# Altium PCB slave.PcbDoc (part 1 of 7)
Units mil, origin at the board's own origin, x right, y up, seen from the top; angles counter-clockwise.
Board outline 6299.21 x 3937.01 mil, 6 copper layers (Top Copper, FUSED_VBAT-, Signal Layer 2, Signal Layer 3, VREG, Bot Copper), stack 65.355 mil thick; 495 components, 307 nets, 1435 pads, 1866 vias.
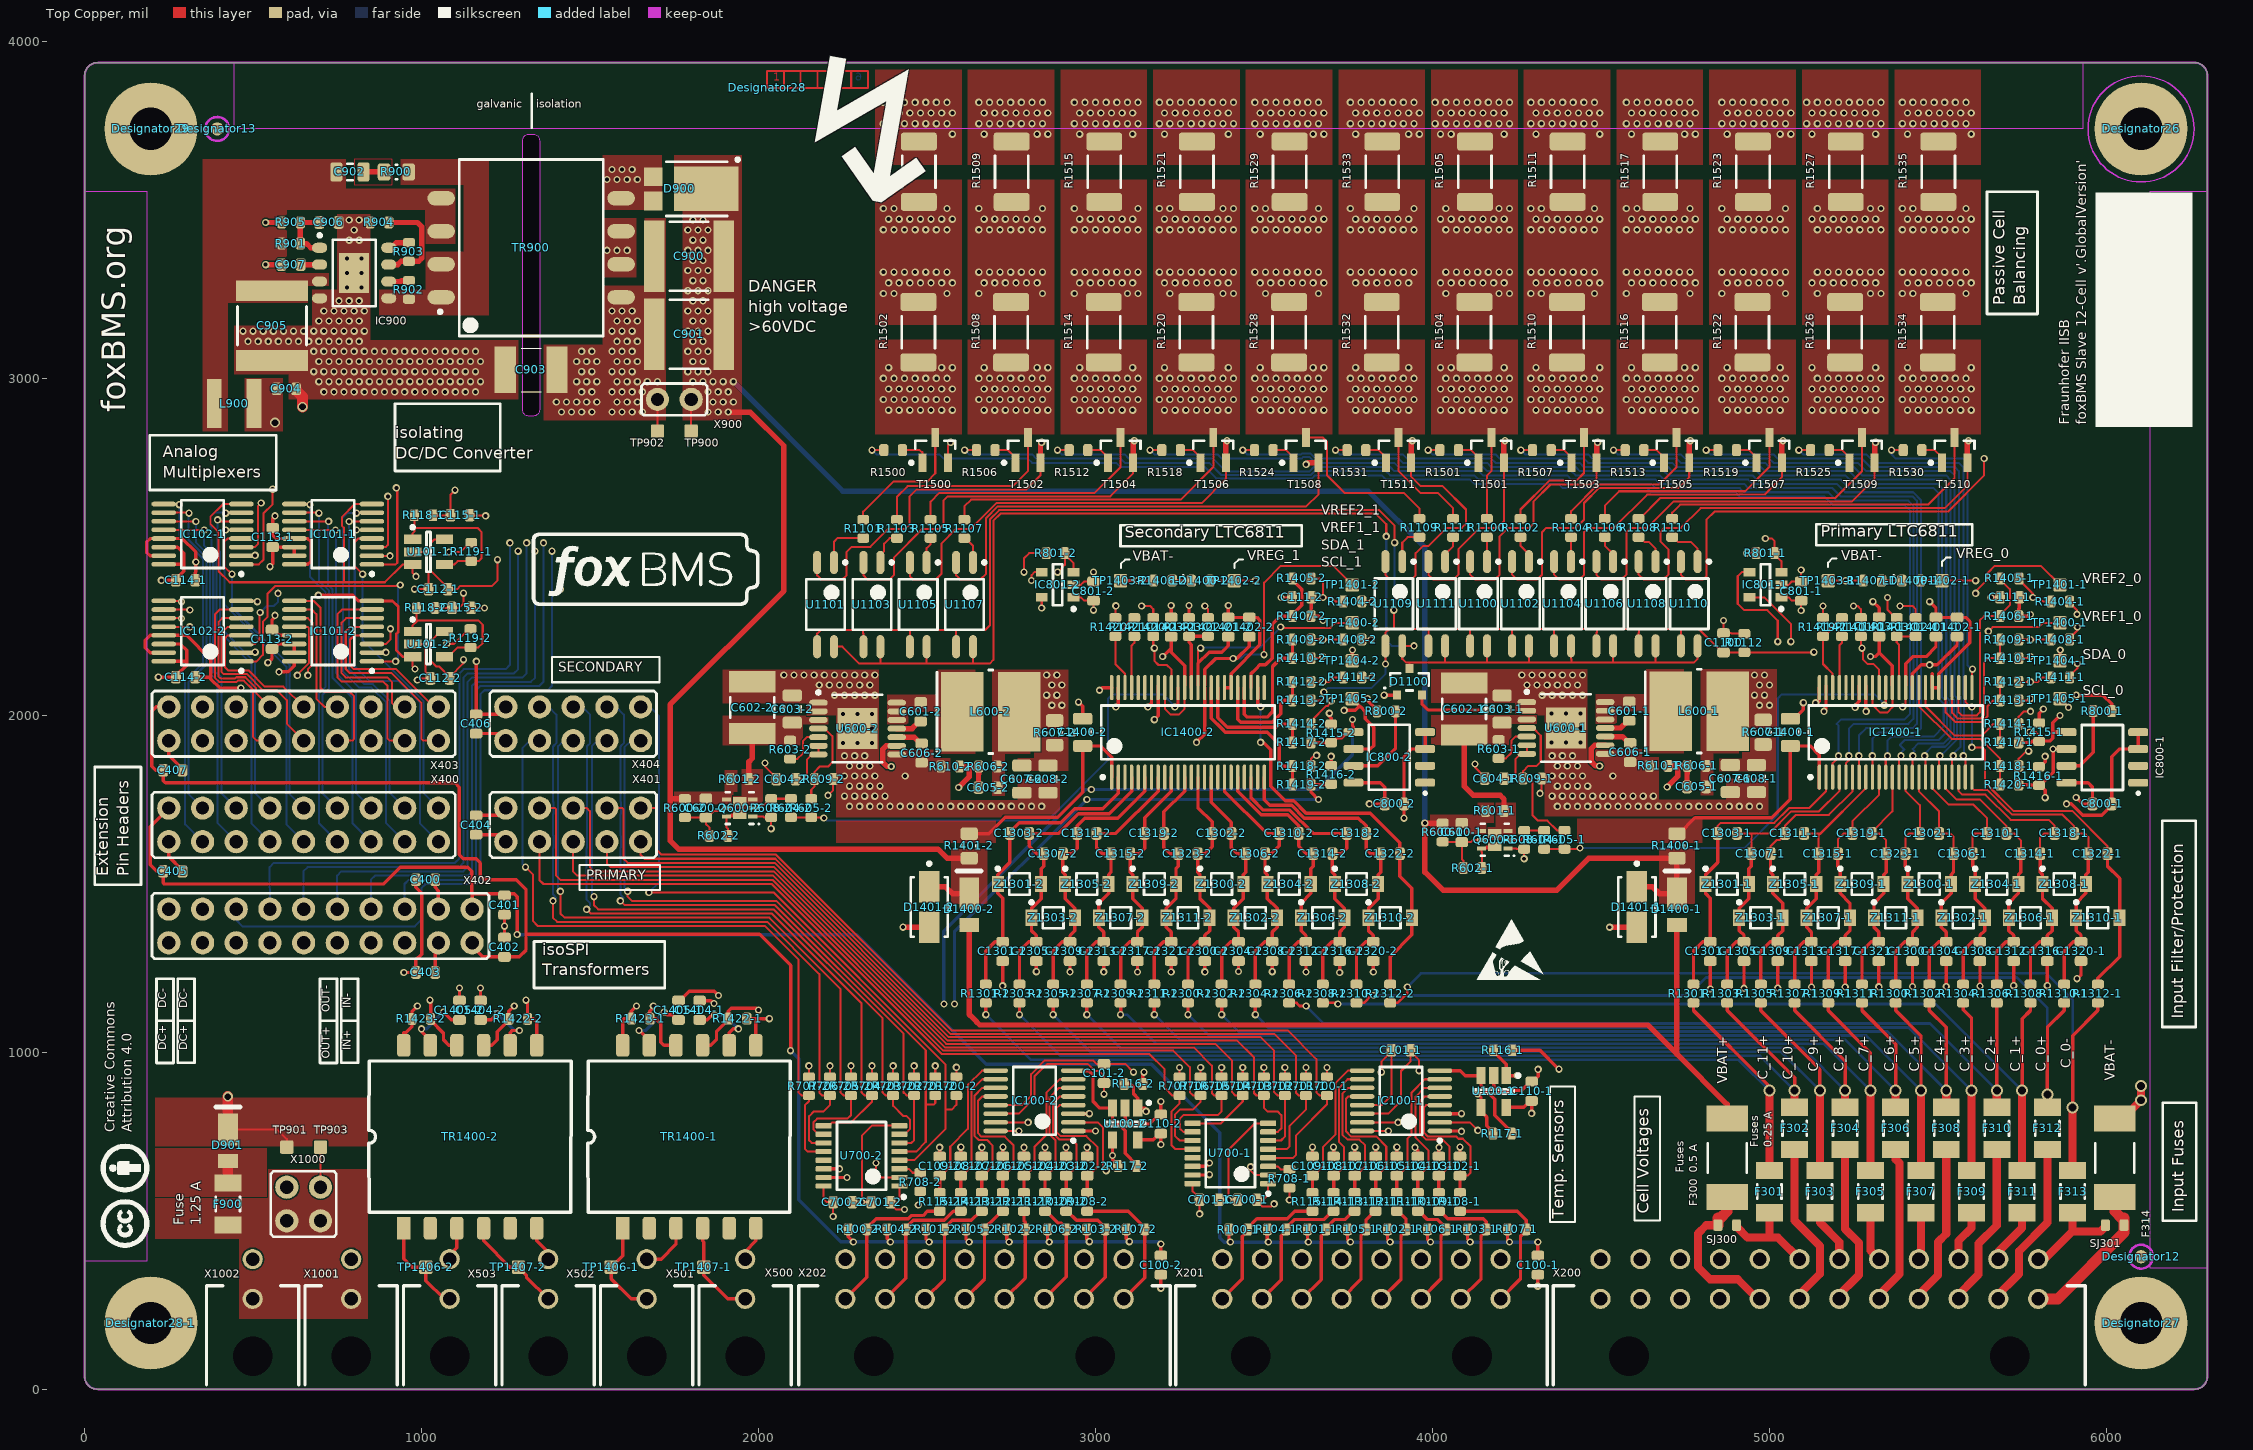
[diagram p0: Top Copper view]
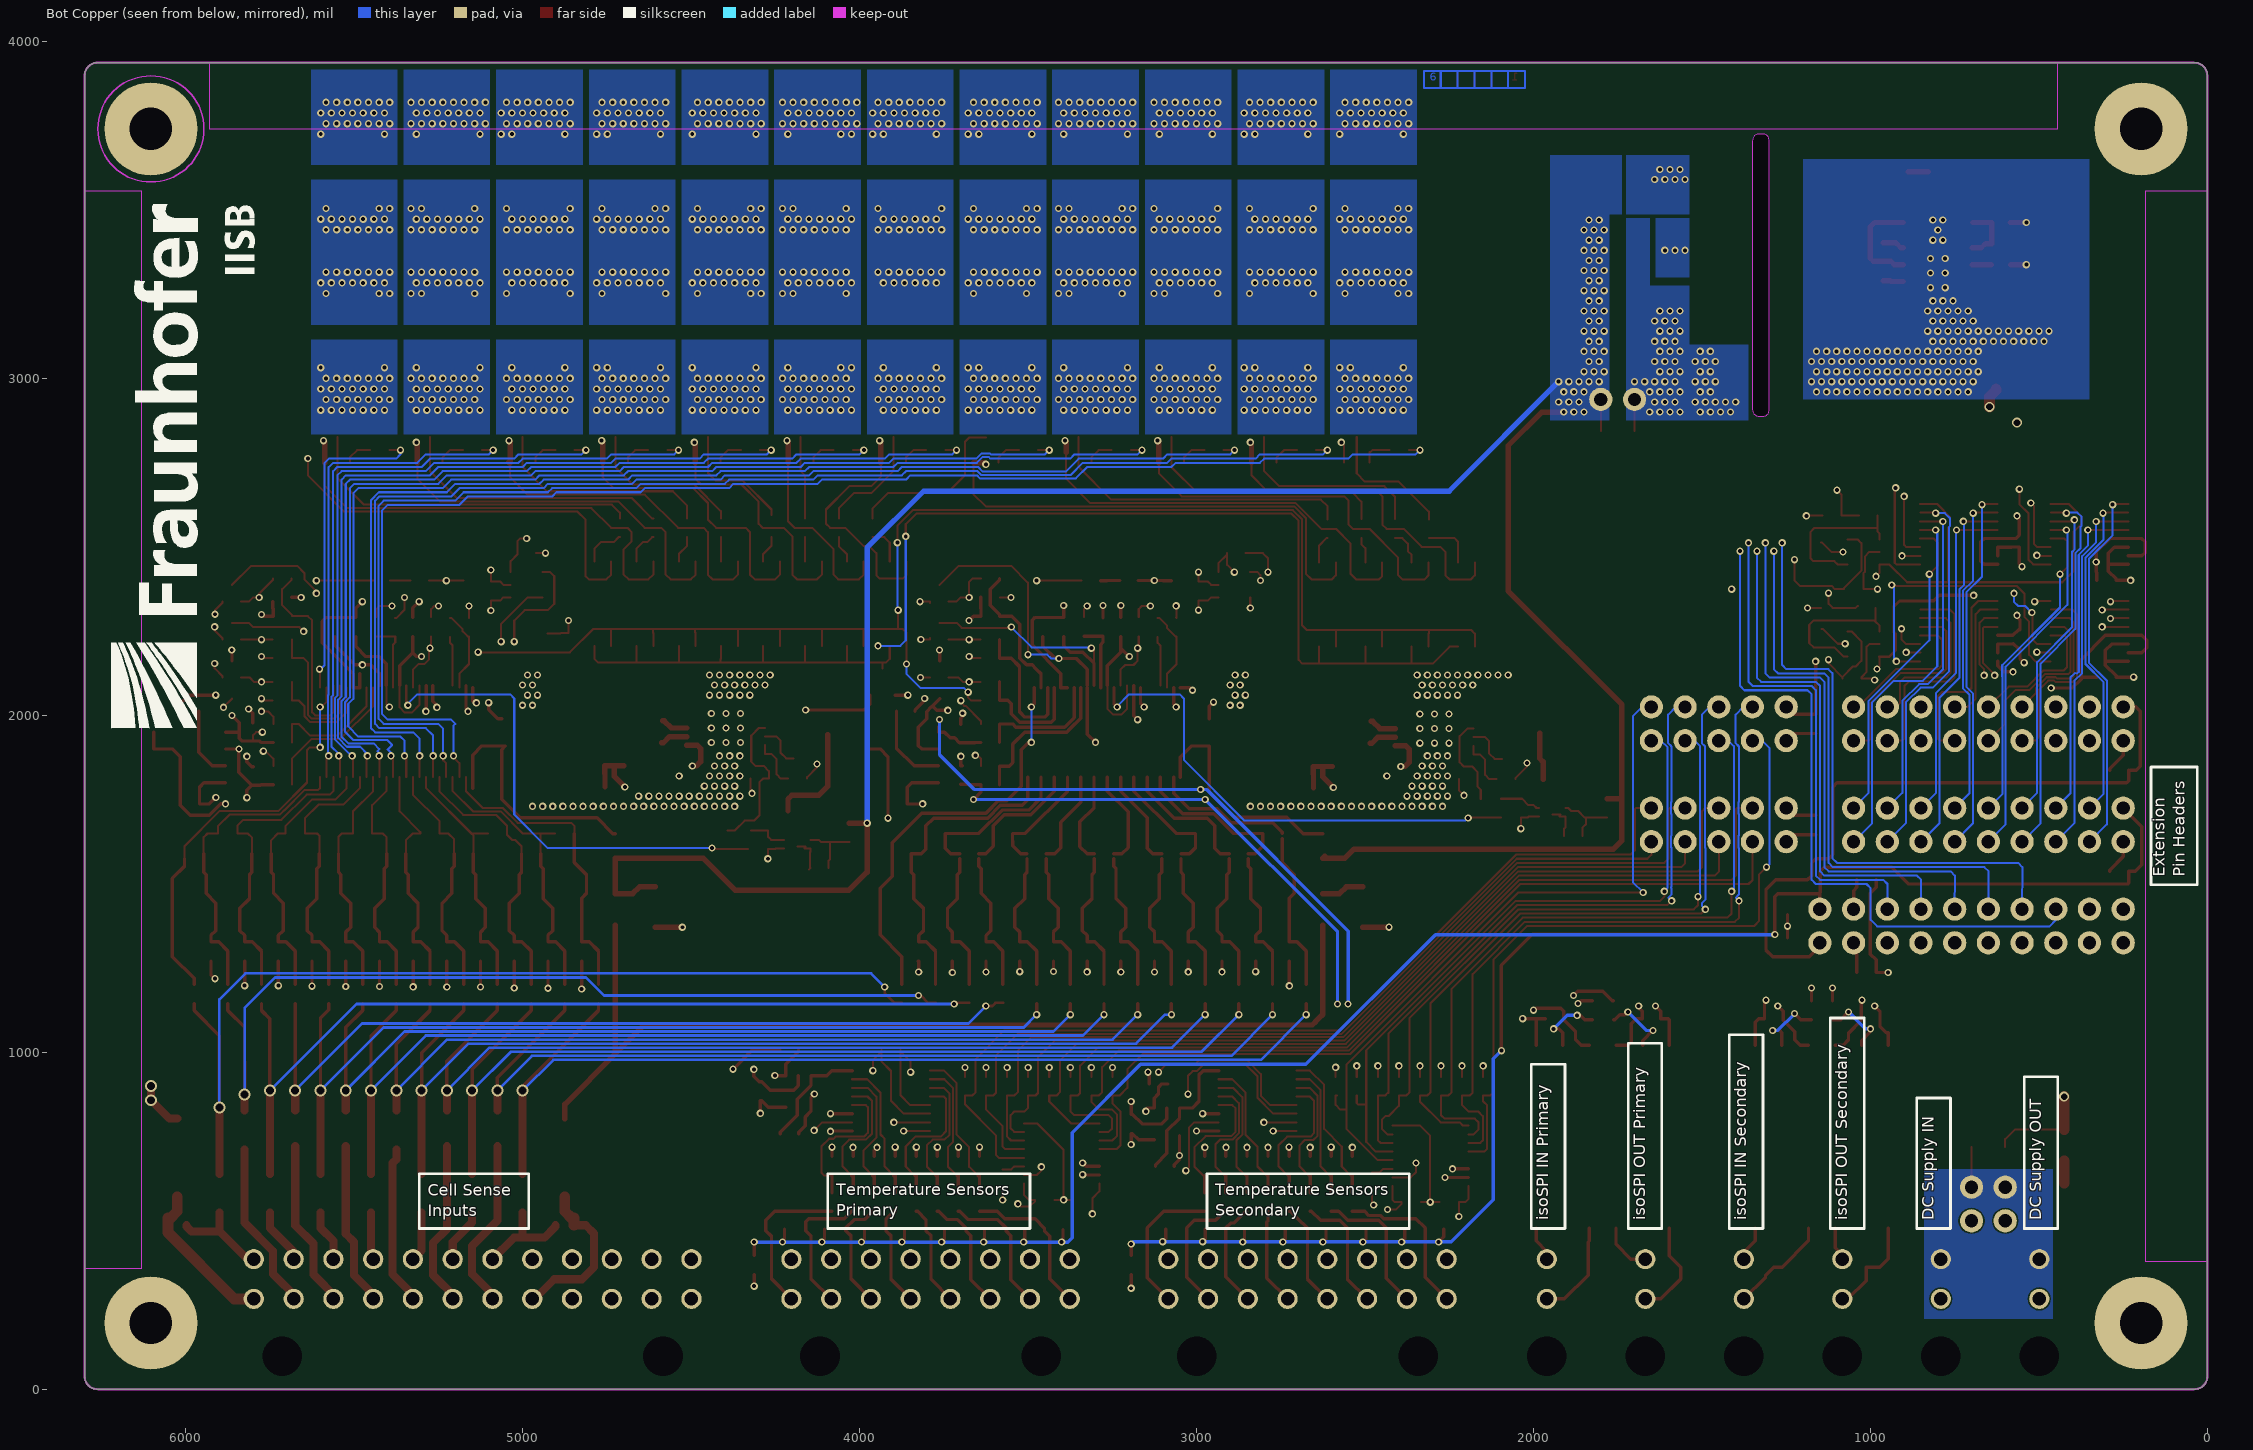
[diagram p1: Bot Copper view, seen from below]
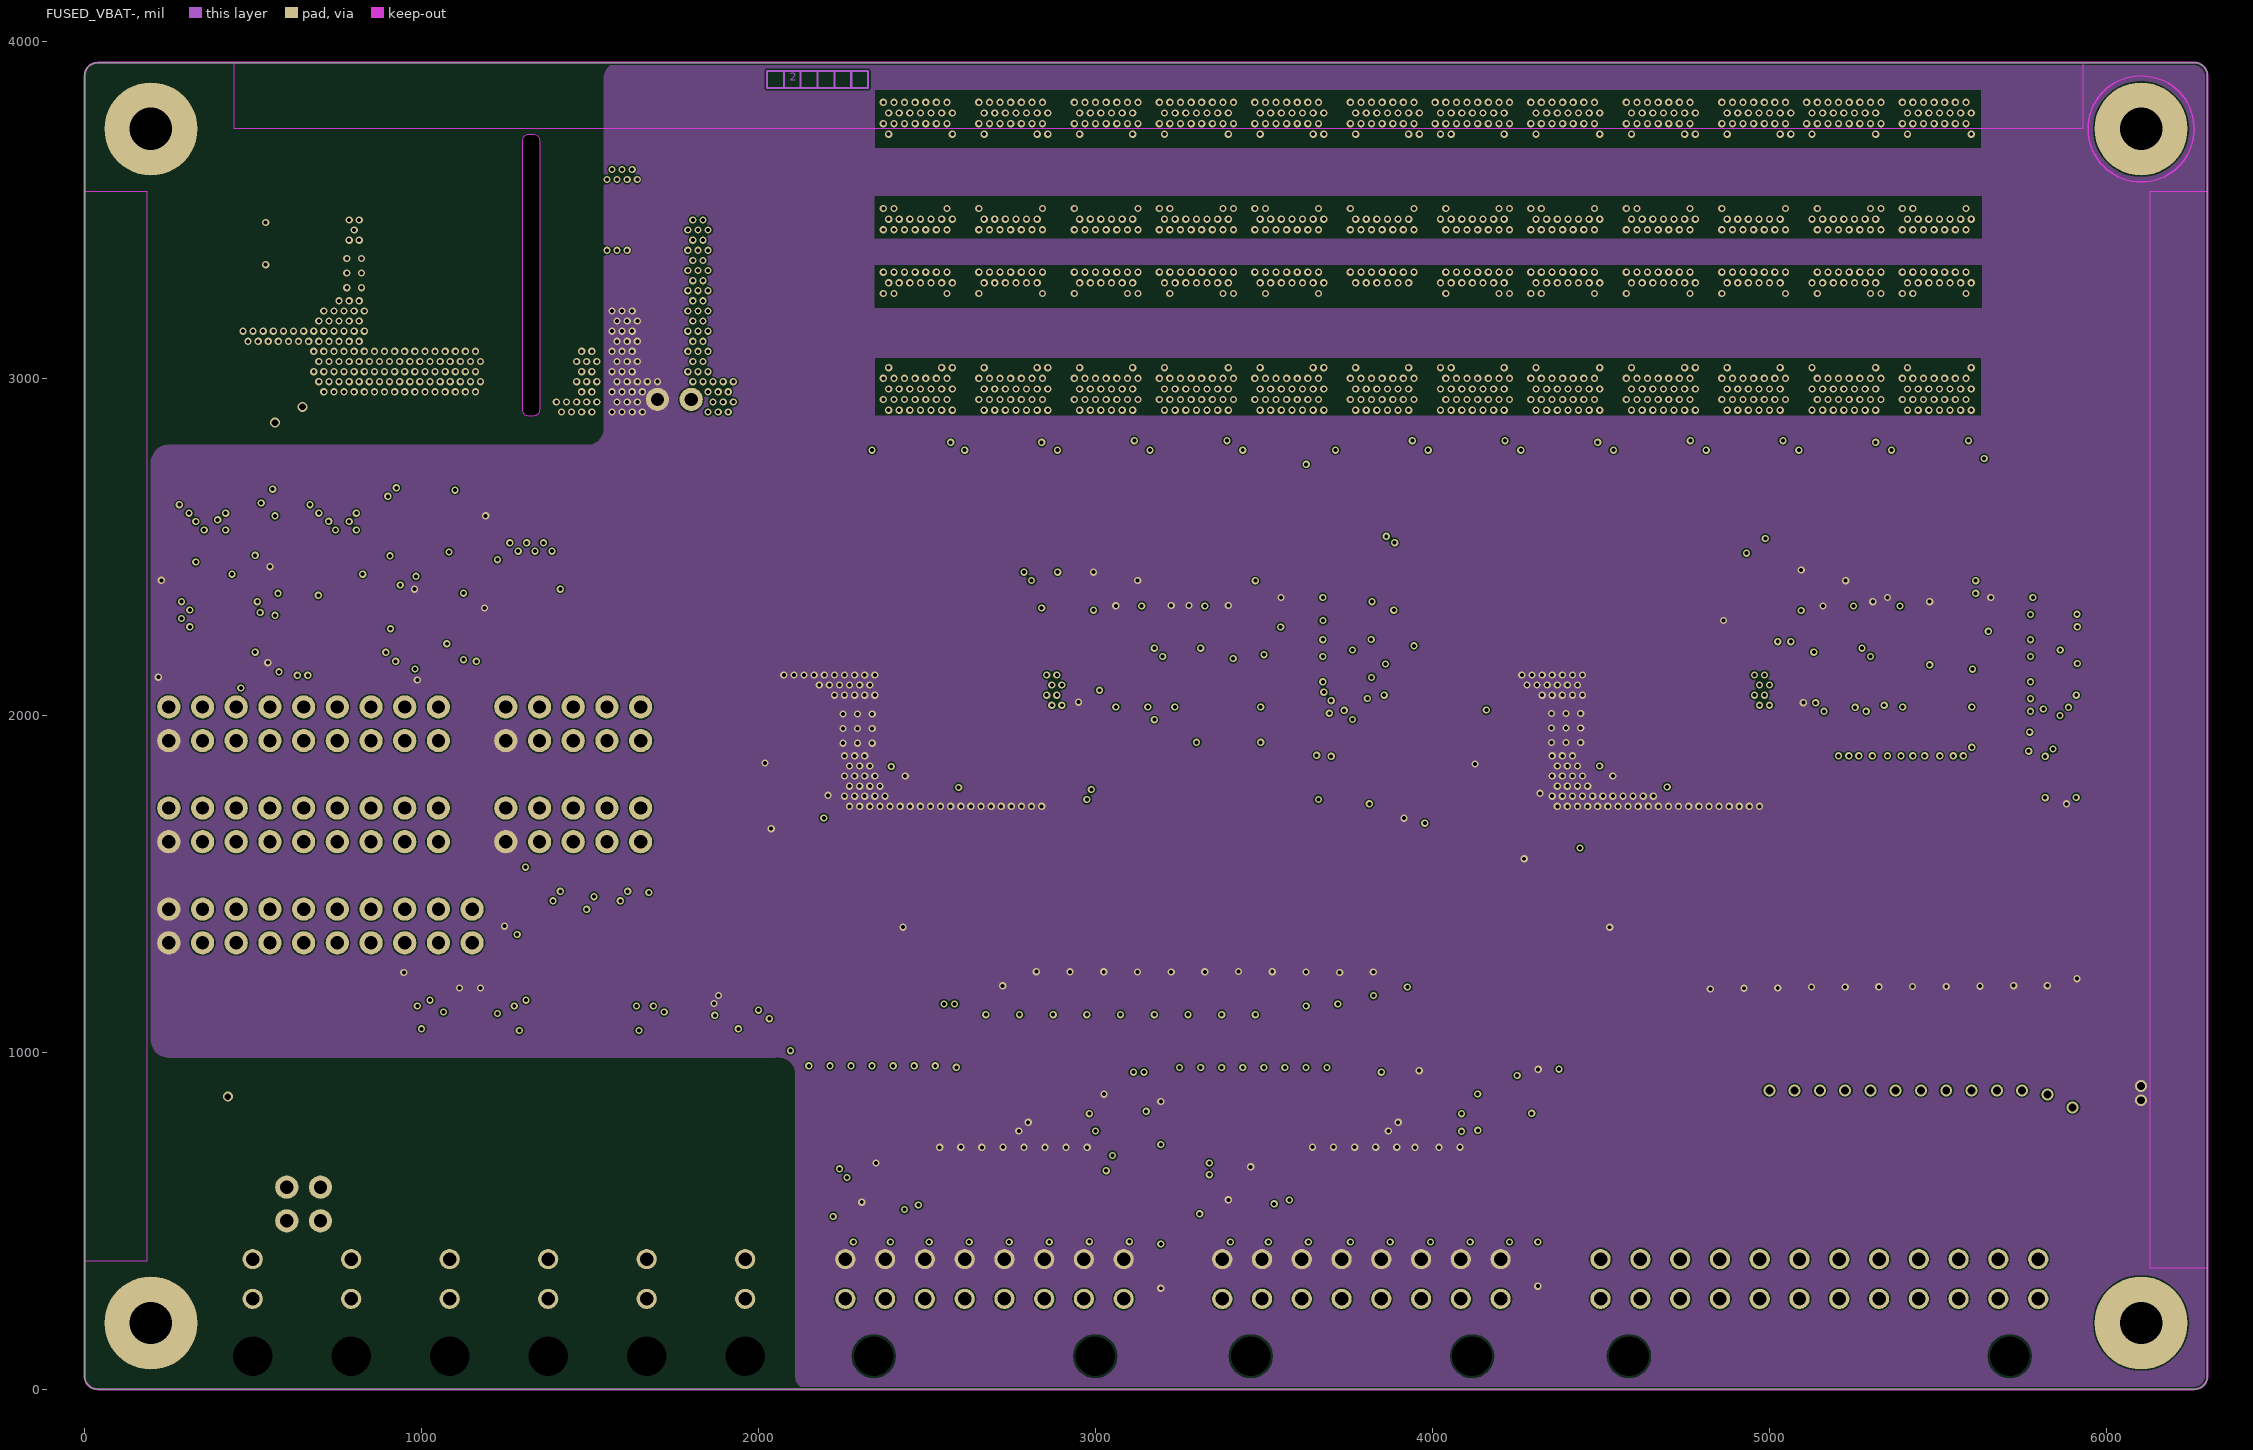
[diagram p2: FUSED_VBAT-]
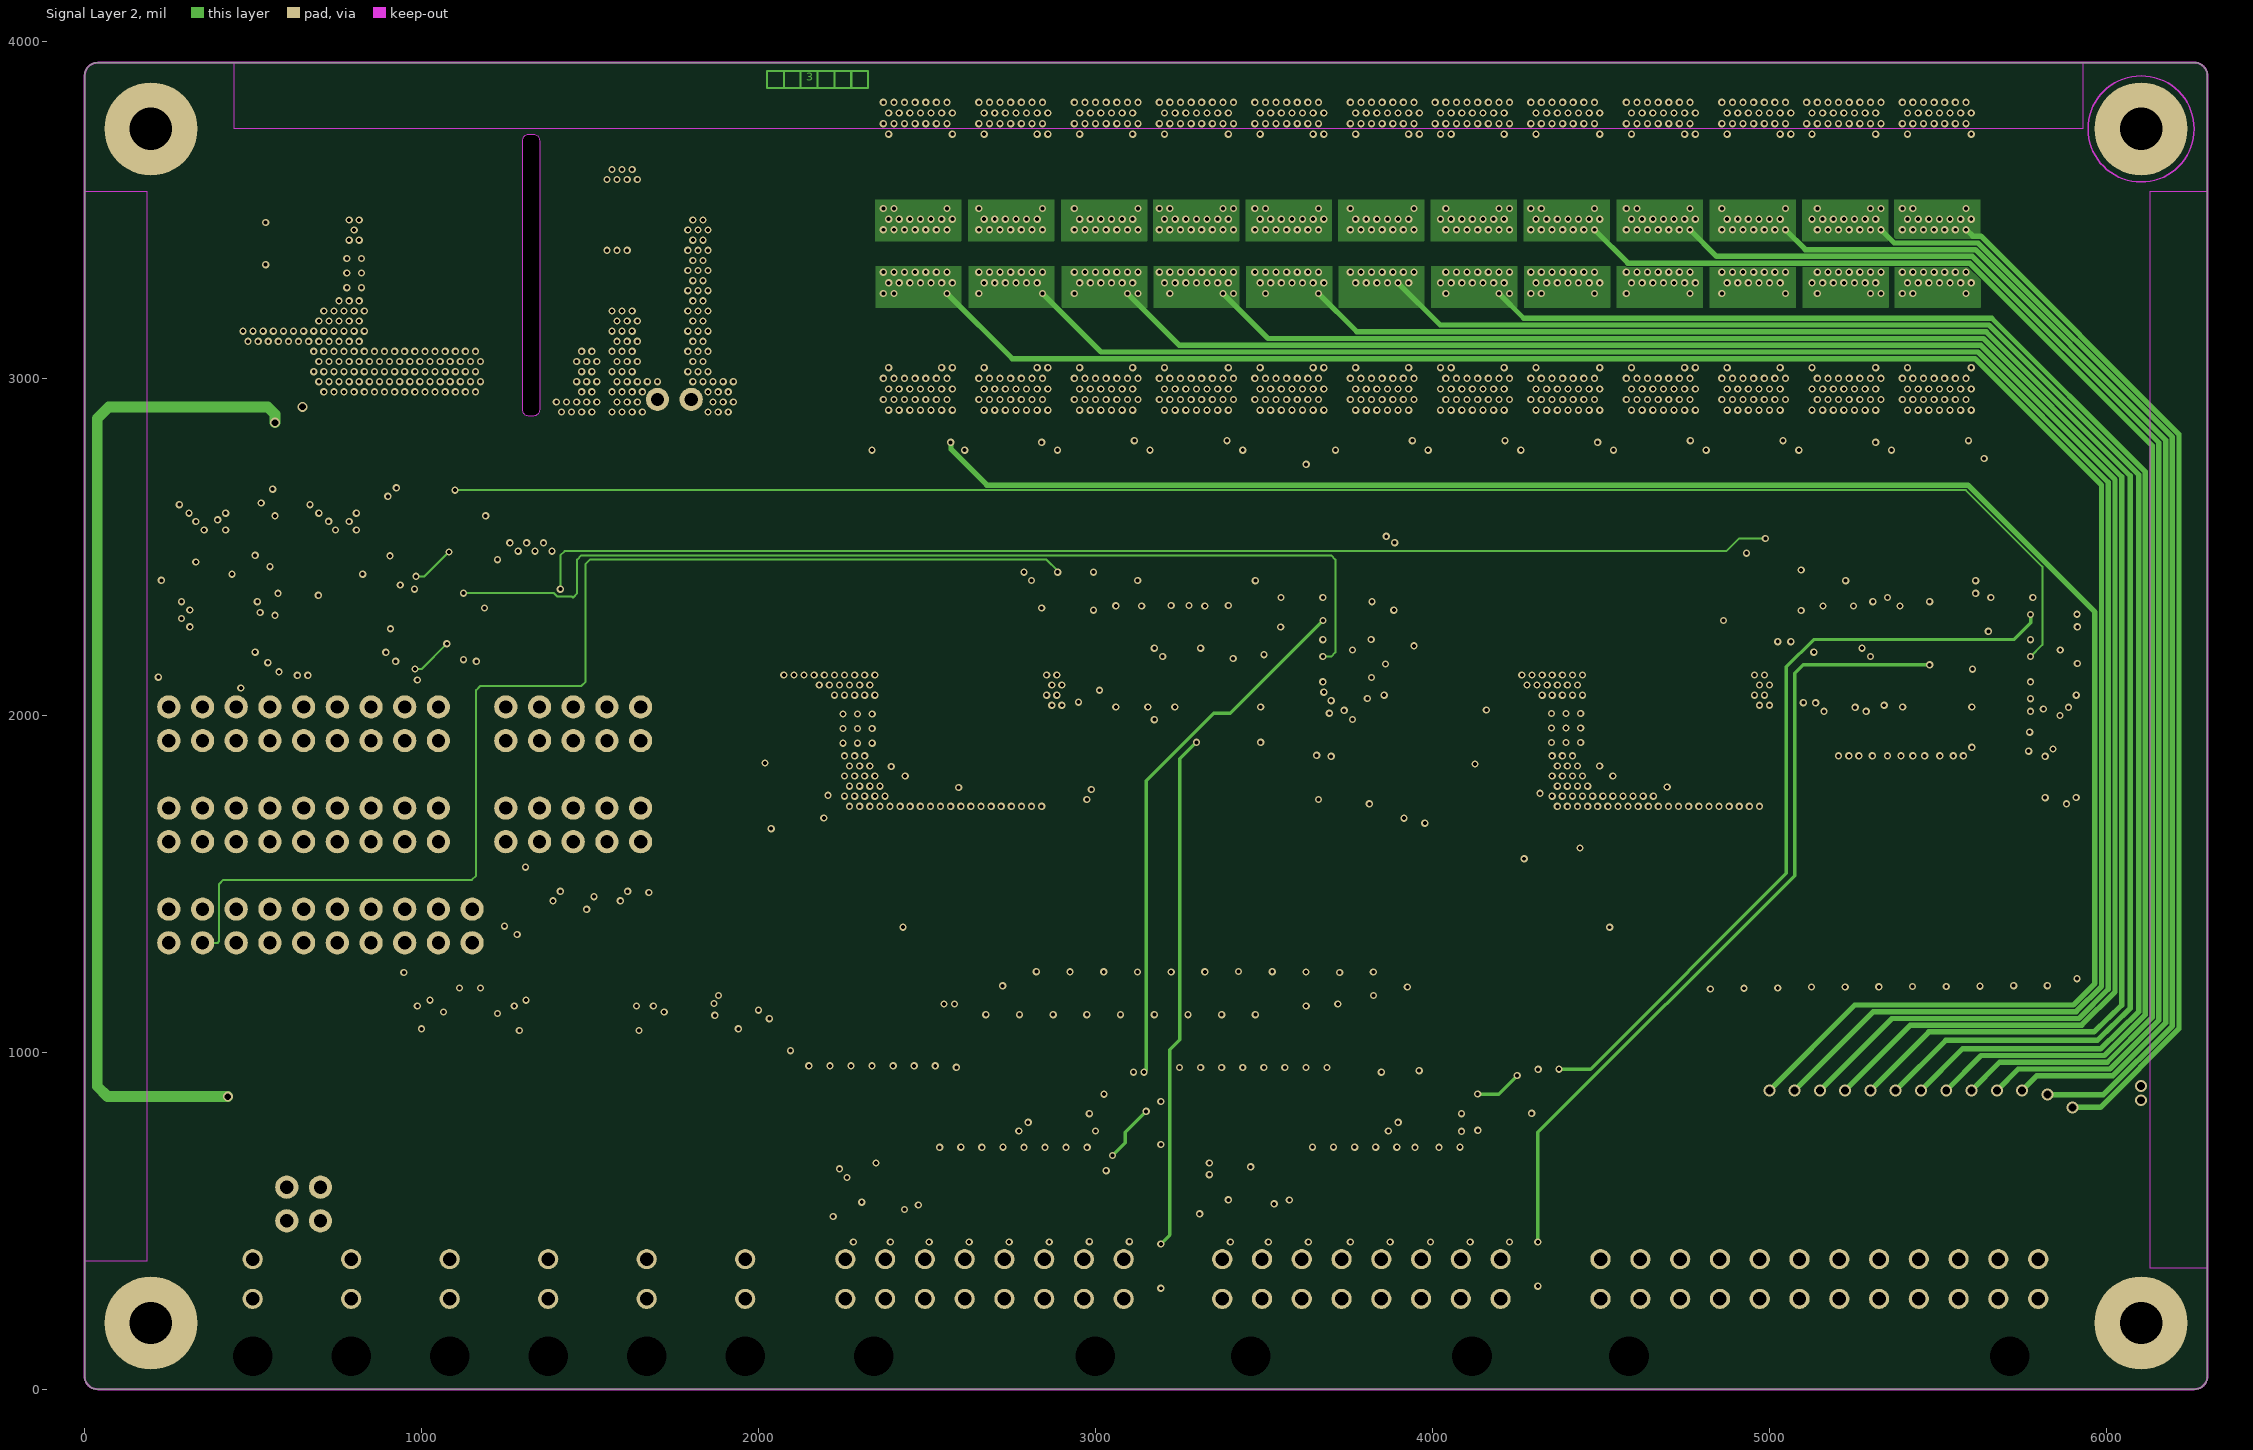
[diagram p3: Signal Layer 2]
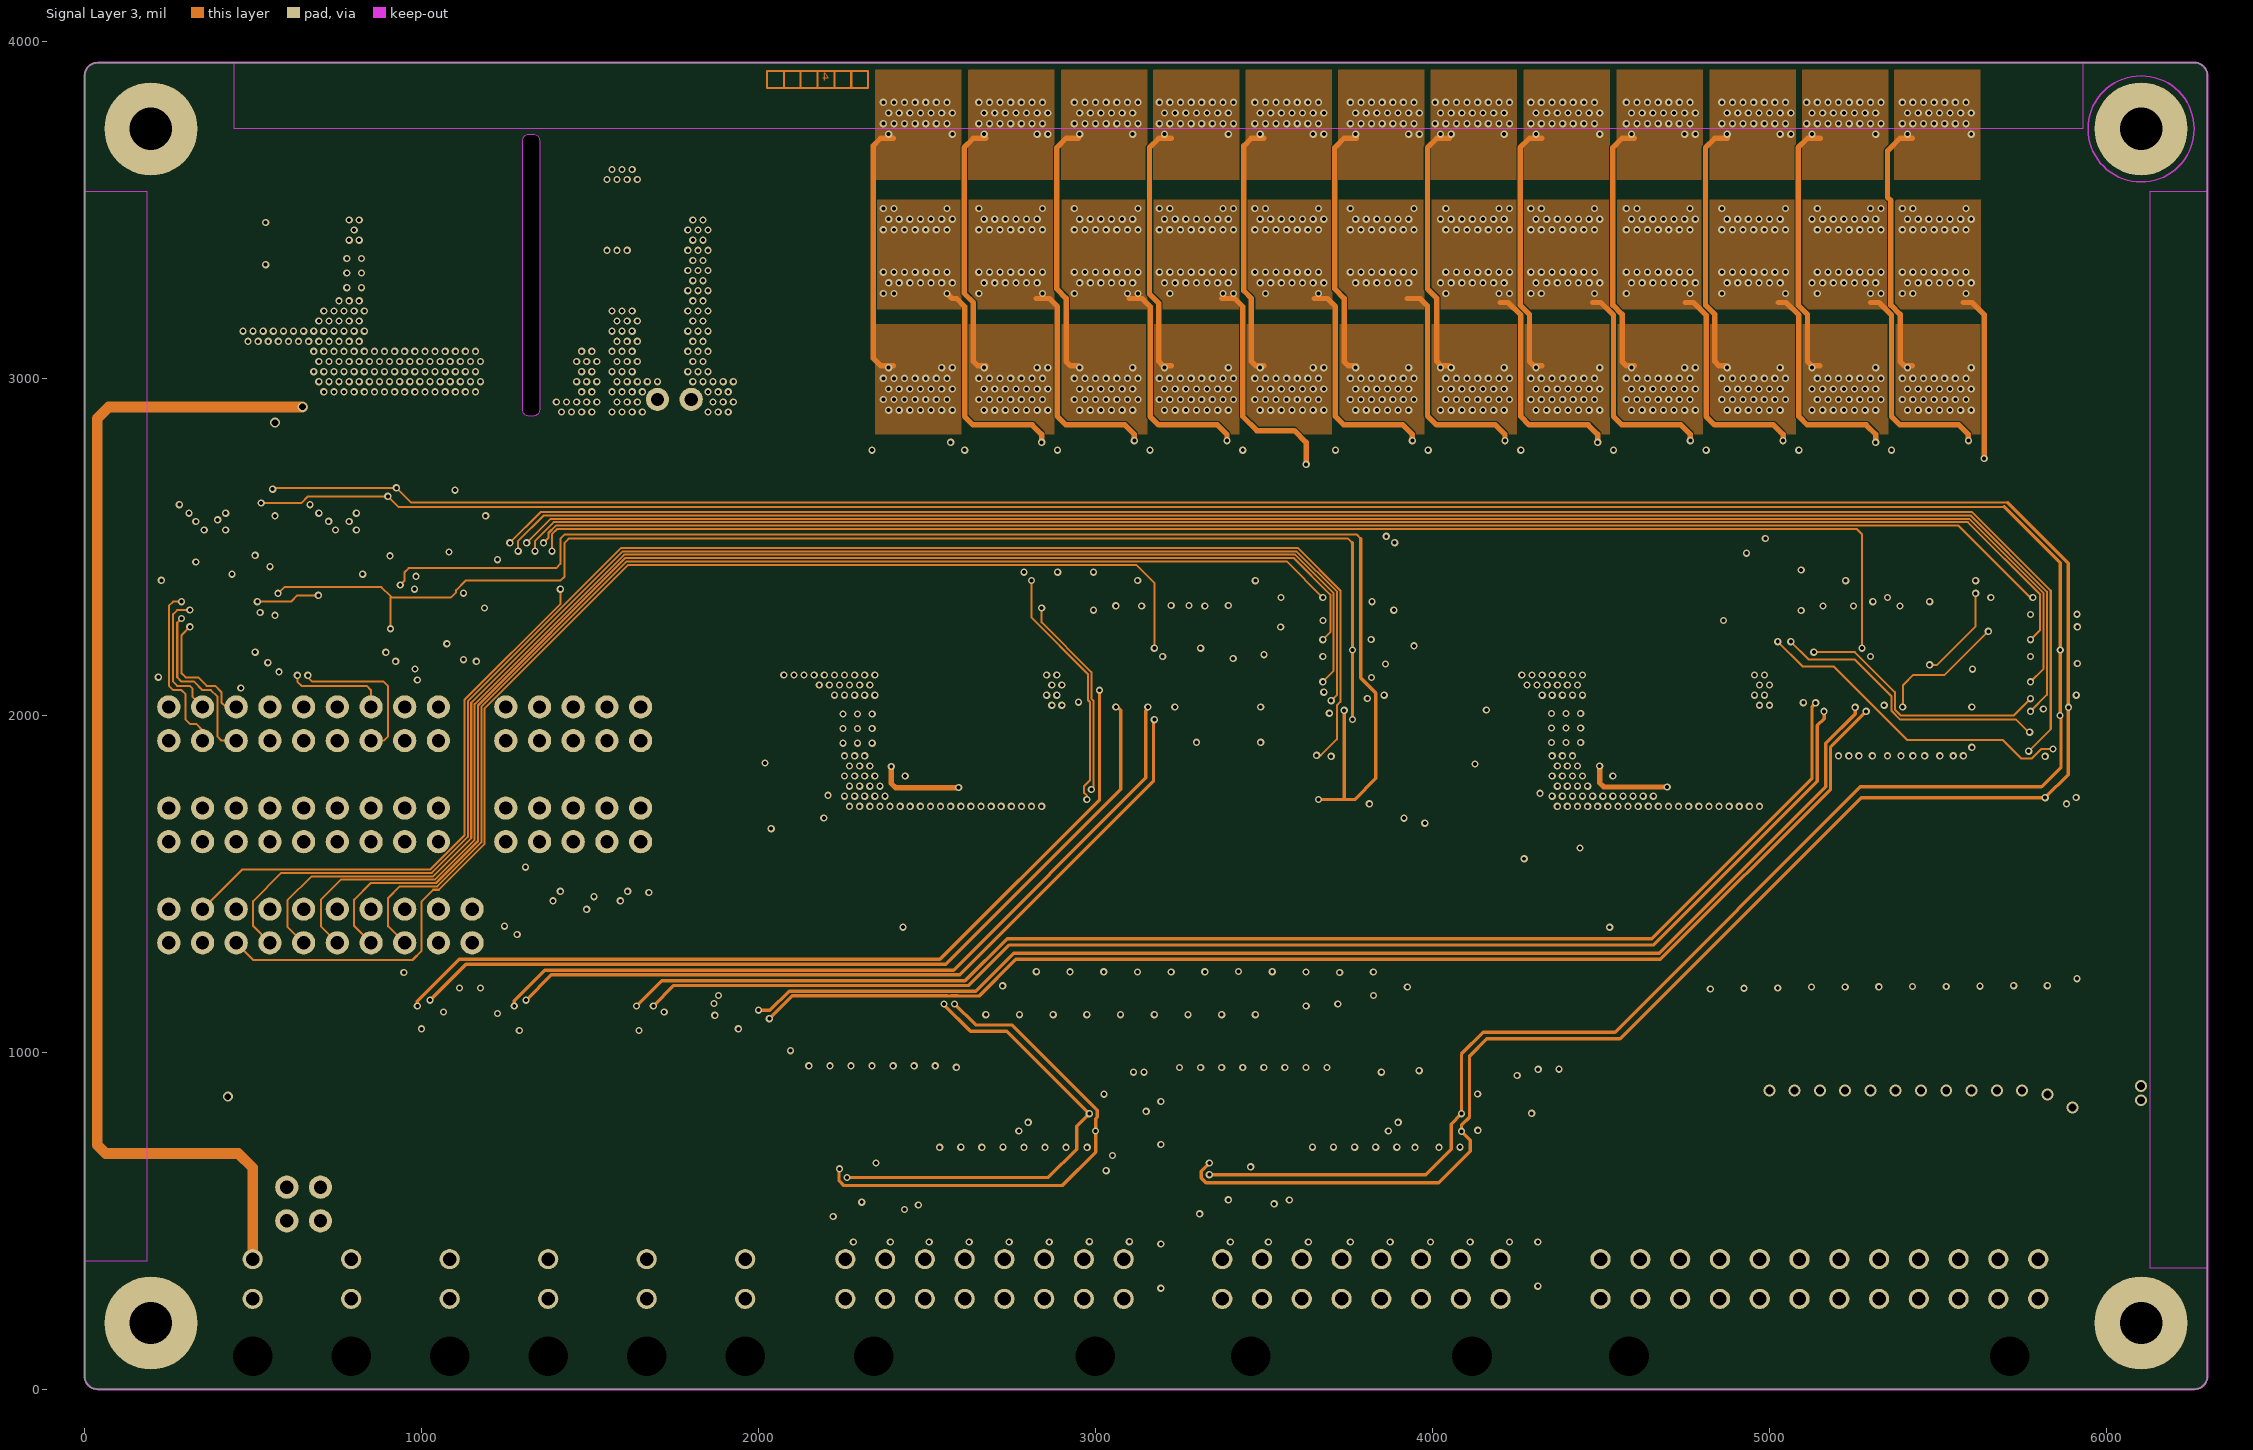
[diagram p4: Signal Layer 3]
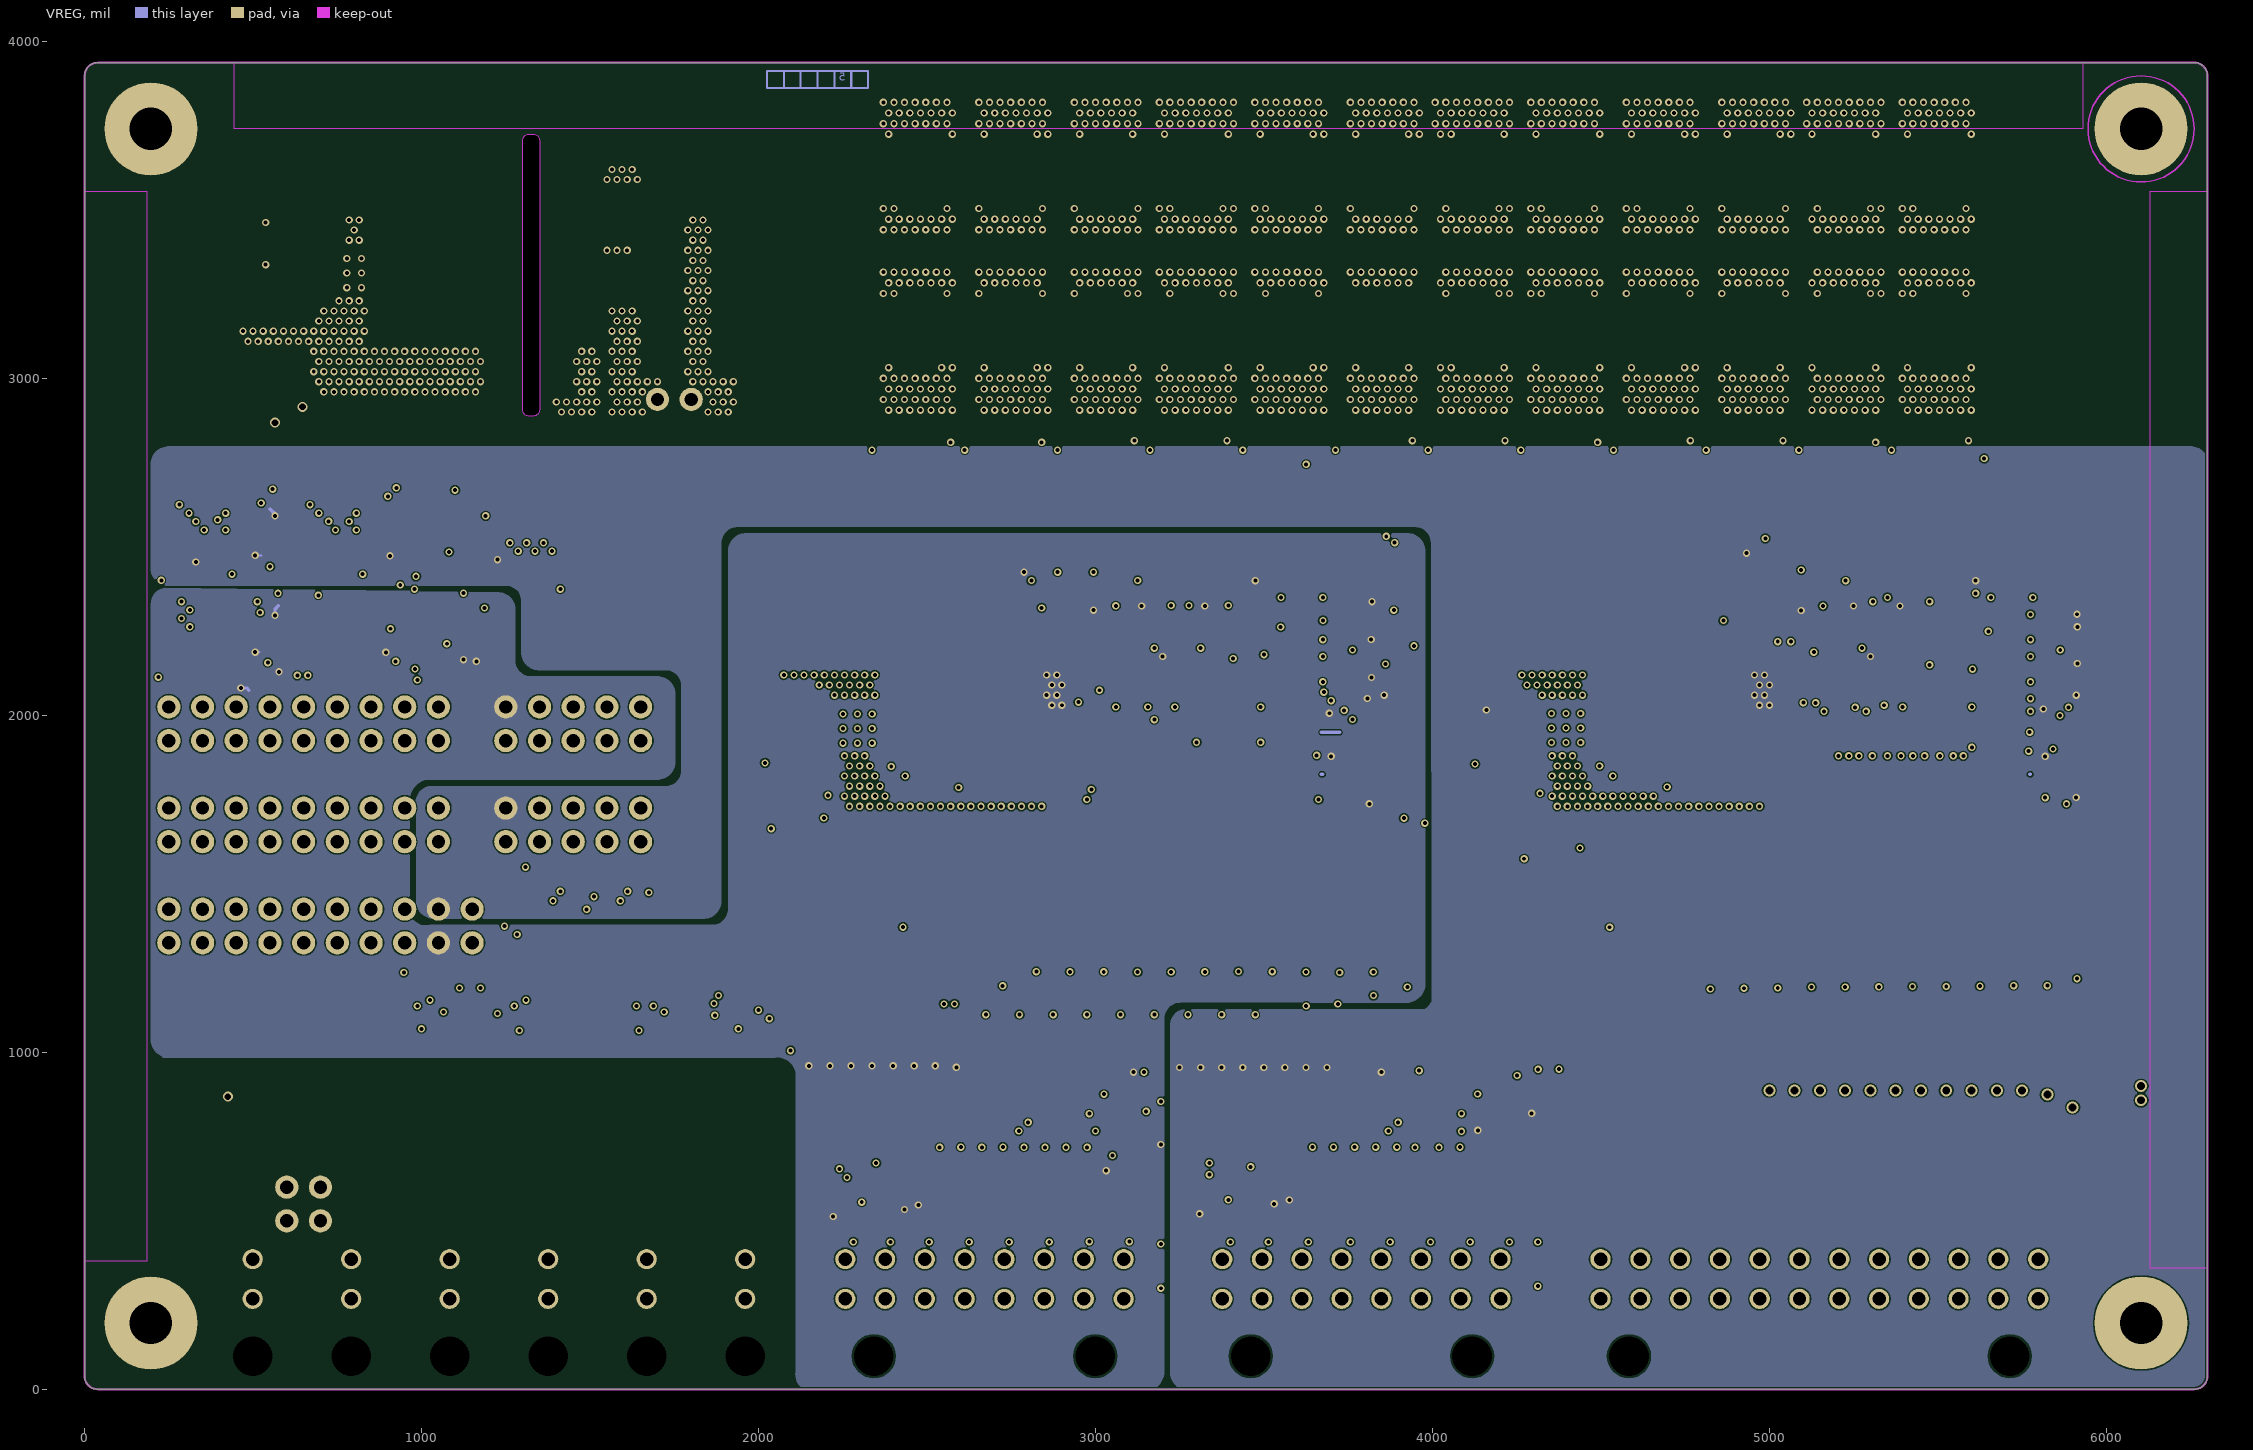
[diagram p5: VREG]

## Layer stack, top to bottom
Top Solder: solder mask 0.5906, Solder Resist, Dk 3.5
Top Copper: signal copper 1.378
Dielectric 1: prepreg 7.874, FR-4, Dk 4.2
FUSED_VBAT-: signal copper 1.378
Dielectric 2: core 13.7795, FR-4, Dk 4.2
Signal Layer 2: signal copper 1.378
Dielectric 3: prepreg 13.7795, FR-4, Dk 4.2
Signal Layer 3: signal copper 1.378
Dielectric 4: core 13.7795, FR-4, Dk 4.2
VREG: signal copper 1.378
Dielectric 5: prepreg 7.874, FR-4, Dk 4.2
Bot Copper: signal copper 1.378
Bottom Solder: solder mask 0.5906, Solder Resist, Dk 3.5

## Board outline
39.37,3937.01 6259.84,3937.01 cw(c6259.84,3897.64) 6299.21,3897.64 6299.21,39.37 cw(c6259.84,39.37) 6259.84,0 39.37,0 cw(c39.37,39.37) 0,39.37 0,3897.64 cw(c39.37,3897.64)
cut-out: 1349.99,3705.32 1349.99,2907.19 cw(c1330.31,2907.18) 1330.32,2887.5 1319.68,2887.5 cw(c1319.68,2907.19) 1299.99,2907.19 1299.99,3705.32 cw(c1319.68,3705.31) 1319.68,3725 1330.32,3725 cw(c1330.32,3705.32)

## Design rules (kind name [scope] priority, off if disabled: settings)
AssemblyTestPointUsage [All] p1 off:
AssemblyTestpoint [(IsPad And (OnTopLayer Or OnBottomLayer)) Or (IsPad And OnMultiLayer)] p1 off: testpointundercomponent=FALSE minsize=40 maxsize=100 preferedsize=60 minholesize=0 maxholesize=40 preferedholesize=32 testpointgrid=1 usegrid=TRUE gridtolerance=0.01 allowsidetop=TRUE
BoardOutlineClearance [All] p1: gap=8 ignorepadtopadclearanceinfootprint=FALSE except(20: Arc-CavityEdge Track-CavityEdge SMDPad-CavityEdge THPad-CavityEdge Via-CavityEdge Fill-CavityEdge Poly-CavityEdge Region-CavityEdge Text-CavityEdge)
Clearance [All] p1: gap=4 ignorepadtopadclearanceinfootprint=TRUE except(6: Arc-Text Arc-Hole Track-Text Track-Hole SMDPad-Text SMDPad-Hole THPad-Text THPad-Hole Via-Text Via-Hole Fill-Text Fill-Hole Poly-Text Poly-Hole Region-Text Region-Hole Text-Text Text-Hole; 8: Arc-Via Track-Via SMDPad-Via THPad-Via Via-Via)
FabricationTestpoint [All] p1: side=1 testpointundercomponent=TRUE minsize=20 maxsize=300 preferedsize=60 minholesize=0 maxholesize=40 preferedholesize=32 testpointgrid=1 allowsidetop=TRUE usegrid=FALSE gridtolerance=0.01
HoleSize [All] p1: absolutevalues=TRUE maxlimit=236 minlimit=7.87 maxpercent=80.000 minpercent=20.000
HoleToHoleClearance [All] p1: gap=6 allowstackedmicrovias=TRUE
MinimumAnnularRing [All] p1: minimumring=4
MinimumSolderMaskSliver [All] p1: minsoldermaskwidth=4
PlaneConnect [All] p1: planeconnectstyle=Direct reliefexpansion=20 reliefentries=4 reliefconductorwidth=10 reliefairgap=10
PolygonConnect [All] p1: connectstyle=Direct reliefconductorwidth=10 reliefentries=4 polygonreliefangle="90 Angle" airgapwidth=10
RoutingVias [All] p1: holewidth=8 width=17.72 viastyle="Through Hole" minholewidth=7.87 minwidth=17.72 maxholewidth=39.37 maxwidth=275.59 useviatemplates=TRUE viatemplateguid#1={735CFFC7-7FCB-400B-90A4-091FB491FE8E} viatemplateguid#2={C77E48B5-D72A-43E5-B607-882EEF7DF4B8} viatemplateguid#3={BCBA6DA9-2A6C-489C-89BE-4D46AD43197C} viatemplateguid#4={1CB78F7B-8890-4ECE-AB9B-0386D27855BF} viatemplatename#1=0.3mm_tented viatemplatename#2=0.4mm_tented viatemplatename#3=0.5mm_tented viatemplatename#4=0.6mm_tented
SMDEntry [All] p1: side=TRUE corner=TRUE anyangle=FALSE
SMDToCorner [All] p1: distance=40000
SilkToSolderMaskClearance [IsPad] p1: minsilkscreentomaskgap=4 clearancetoexposedcopper=FALSE
SolderMaskExpansion SolderMaskExpansion_VIAs [IsVia] p1: expansion=-393.7 // Cover all Vias
SolderMaskExpansion [All] p2: expansion=2
UnRoutedNet [All] p1: checkbadconnections=TRUE
UnpouredPolygon UnpouredPolygon_1 [All] p1:
Width [All] p1: maxlimit=60 minlimit=4 preferedwidth=6
20 further rules are at their usual default settings.

## Classes and differential pairs
net class SECONDARY-T-SENSOR_[0..7]: SECONDARY-T-SENSOR_0 SECONDARY-T-SENSOR_1 SECONDARY-T-SENSOR_2 SECONDARY-T-SENSOR_3 SECONDARY-T-SENSOR_4 SECONDARY-T-SENSOR_5 SECONDARY-T-SENSOR_6 SECONDARY-T-SENSOR_7
net class SECONDARY-DIGITAL-IO_[0..7]: SECONDARY-DIGITAL-IO_0 SECONDARY-DIGITAL-IO_1 SECONDARY-DIGITAL-IO_2 SECONDARY-DIGITAL-IO_3 SECONDARY-DIGITAL-IO_4 SECONDARY-DIGITAL-IO_5 SECONDARY-DIGITAL-IO_6 SECONDARY-DIGITAL-IO_7
net class SECONDARY-C[0..12]: SECONDARY-C0 SECONDARY-C1 SECONDARY-C2 SECONDARY-C3 SECONDARY-C4 SECONDARY-C5 SECONDARY-C6 SECONDARY-C7 SECONDARY-C8 SECONDARY-C9 SECONDARY-C10 SECONDARY-C11 SECONDARY-C12
net class SECONDARY-ANALOG-IN_[0..15]: SECONDARY-ANALOG-IN_0 SECONDARY-ANALOG-IN_1 SECONDARY-ANALOG-IN_2 SECONDARY-ANALOG-IN_3 SECONDARY-ANALOG-IN_4 SECONDARY-ANALOG-IN_5 SECONDARY-ANALOG-IN_6 SECONDARY-ANALOG-IN_7 SECONDARY-ANALOG-IN_8 SECONDARY-ANALOG-IN_9 SECONDARY-ANALOG-IN_10 SECONDARY-ANALOG-IN_11 SECONDARY-ANALOG-IN_12 SECONDARY-ANALOG-IN_13 SECONDARY-ANALOG-IN_14 SECONDARY-ANALOG-IN_15
net class S[0..12]: S0 S1 S2 S3 S4 S5 S6 S7 S8 S9 S10 S11 S12
net class PRIMARY-T-SENSOR_[0..7]: PRIMARY-T-SENSOR_0 PRIMARY-T-SENSOR_1 PRIMARY-T-SENSOR_2 PRIMARY-T-SENSOR_3 PRIMARY-T-SENSOR_4 PRIMARY-T-SENSOR_5 PRIMARY-T-SENSOR_6 PRIMARY-T-SENSOR_7
net class PRIMARY-DIGITAL-IO_[0..7]: PRIMARY-DIGITAL-IO_0 PRIMARY-DIGITAL-IO_1 PRIMARY-DIGITAL-IO_2 PRIMARY-DIGITAL-IO_3 PRIMARY-DIGITAL-IO_4 PRIMARY-DIGITAL-IO_5 PRIMARY-DIGITAL-IO_6 PRIMARY-DIGITAL-IO_7
net class PRIMARY-C[0..12]: PRIMARY-C0 PRIMARY-C1 PRIMARY-C2 PRIMARY-C3 PRIMARY-C4 PRIMARY-C5 PRIMARY-C6 PRIMARY-C7 PRIMARY-C8 PRIMARY-C9 PRIMARY-C10 PRIMARY-C11 PRIMARY-C12
net class PRIMARY-ANALOG-IN_[0..15]: PRIMARY-ANALOG-IN_0 PRIMARY-ANALOG-IN_1 PRIMARY-ANALOG-IN_2 PRIMARY-ANALOG-IN_3 PRIMARY-ANALOG-IN_4 PRIMARY-ANALOG-IN_5 PRIMARY-ANALOG-IN_6 PRIMARY-ANALOG-IN_7 PRIMARY-ANALOG-IN_8 PRIMARY-ANALOG-IN_9 PRIMARY-ANALOG-IN_10 PRIMARY-ANALOG-IN_11 PRIMARY-ANALOG-IN_12 PRIMARY-ANALOG-IN_13 PRIMARY-ANALOG-IN_14 PRIMARY-ANALOG-IN_15
polygon class PolygonThermal_OFF: Polygon_1_Net_+5.0V_VREG_0 Polygon_1_Net_+5.0V_VREG_1 Polygon_1_Net_CELL0_FEEDBACK+ Polygon_1_Net_CELL0_FEEDBACK+1 Polygon_1_Net_CELL1_FEEDBACK+ Polygon_1_Net_CELL1_FEEDBACK+1 Polygon_1_Net_CELL2_FEEDBACK+ Polygon_1_Net_CELL2_FEEDBACK+1 Polygon_1_Net_CELL3_FEEDBACK+ Polygon_1_Net_CELL3_FEEDBACK+1 Polygon_1_Net_CELL4_FEEDBACK+ Polygon_1_Net_CELL4_FEEDBACK+1 Polygon_1_Net_CELL5_FEEDBACK+ Polygon_1_Net_CELL5_FEEDBACK+1 Polygon_1_Net_CELL6_FEEDBACK+ Polygon_1_Net_CELL6_FEEDBACK+1 Polygon_1_Net_CELL7_FEEDBACK+ Polygon_1_Net_CELL7_FEEDBACK+1 Polygon_1_Net_CELL8_FEEDBACK+ Polygon_1_Net_CELL8_FEEDBACK+1 Polygon_1_Net_CELL9_FEEDBACK+ Polygon_1_Net_CELL9_FEEDBACK+1 Polygon_1_Net_CELL10_FEEDBACK+ Polygon_1_Net_CELL10_FEEDBACK+1 Polygon_1_Net_CELL11_FEEDBACK+ Polygon_1_Net_CELL11_FEEDBACK+1 Polygon_1_Net_EXT_DC_IN+ Polygon_1_Net_FUSED_CELL_0+ Polygon_1_Net_FUSED_CELL_0- Polygon_1_Net_FUSED_CELL_1+ Polygon_1_Net_FUSED_CELL_2+ Polygon_1_Net_FUSED_CELL_3+ Polygon_1_Net_FUSED_CELL_4+ Polygon_1_Net_FUSED_CELL_5+ Polygon_1_Net_FUSED_CELL_6+ Polygon_1_Net_FUSED_CELL_7+ Polygon_1_Net_FUSED_CELL_8+ Polygon_1_Net_FUSED_CELL_9+ Polygon_1_Net_FUSED_CELL_10+ Polygon_1_Net_FUSED_VBAT- Polygon_1_Net_N$4 Polygon_1_Net_N$11 Polygon_1_Net_N$13 Polygon_1_Net_N$19 Polygon_1_Net_N$21 Polygon_1_Net_N$23 Polygon_1_Net_N$24 Polygon_1_Net_N$27 Polygon_1_Net_N$29 Polygon_1_Net_N$41 Polygon_1_Net_N$43 Polygon_1_Net_N$46 Polygon_1_Net_N$48 Polygon_1_Net_N$89 Polygon_2_Net_CELL0_FEEDBACK+ Polygon_2_Net_CELL1_FEEDBACK+ Polygon_2_Net_CELL2_FEEDBACK+ Polygon_2_Net_CELL3_FEEDBACK+ Polygon_2_Net_CELL4_FEEDBACK+ Polygon_2_Net_CELL5_FEEDBACK+ Polygon_2_Net_CELL6_FEEDBACK+ Polygon_2_Net_CELL7_FEEDBACK+ Polygon_2_Net_CELL8_FEEDBACK+ Polygon_2_Net_CELL9_FEEDBACK+ Polygon_2_Net_CELL10_FEEDBACK+ Polygon_2_Net_CELL11_FEEDBACK+ Polygon_2_Net_N$91 Polygon_3_Net_CELL0_FEEDBACK+ Polygon_3_Net_CELL1_FEEDBACK+ Polygon_3_Net_CELL2_FEEDBACK+ Polygon_3_Net_CELL3_FEEDBACK+ Polygon_3_Net_CELL4_FEEDBACK+ Polygon_3_Net_CELL5_FEEDBACK+ Polygon_3_Net_CELL6_FEEDBACK+ Polygon_3_Net_CELL7_FEEDBACK+ Polygon_3_Net_CELL8_FEEDBACK+ Polygon_3_Net_CELL9_FEEDBACK+ Polygon_3_Net_CELL10_FEEDBACK+ Polygon_3_Net_CELL11_FEEDBACK+ Polygon_3_Net_EXT_DC_IN- Polygon_4_Net_EXT_DC_ISO+
polygon class Isolate_10: Polygon_1_Net_+5.0V_VREG_0 Polygon_1_Net_+5.0V_VREG_1 Polygon_1_Net_EXT_DC_IN+ Polygon_1_Net_N$89 Polygon_2_Net_N$91 Polygon_3_Net_EXT_DC_IN-
pad class SMDPaste_OFF: IC1601-9 IC1601-P$1

## Components (designator, comment, footprint, x,y, rotation, side; value= is the part's Value field where it differs from the comment)
C100-1 "100n/50V" CAPC1608X08N 4312.5,368.75 r90 top
C100-2 "100n/50V" CAPC1608X08N 3193.75,368.75 r90 top
C101-1 "1u/35V" CAPC1608X08N 3906.25,1006.25 r180 top
C101-2 "1u/35V" CAPC1608X08N 3025,937.5 r90 top
C102-1 "10n/100V" CAPC1608X08N 4081.25,662.5 r270 top locked
C102-2 "10n/100V" CAPC1608X08N 2975,662.5 r270 top
C103-1 "10n/100V" CAPC1608X08N 4018.75,662.5 r270 top
C103-2 "10n/100V" CAPC1608X08N 2912.5,662.5 r270 top locked
C104-1 "10n/100V" CAPC1608X08N 3956.25,662.5 r270 top
C104-2 "10n/100V" CAPC1608X08N 2850,662.5 r270 top
C105-1 "10n/100V" CAPC1608X08N 3893.75,662.5 r270 top
C105-2 "10n/100V" CAPC1608X08N 2787.5,662.5 r270 top
C106-1 "10n/100V" CAPC1608X08N 3831.25,662.5 r270 top
C106-2 "10n/100V" CAPC1608X08N 2725,662.5 r270 top locked
C107-1 "10n/100V" CAPC1608X08N 3768.75,662.5 r270 top locked
C107-2 "10n/100V" CAPC1608X08N 2662.5,662.5 r270 top
C108-1 "10n/100V" CAPC1608X08N 3706.25,662.5 r270 top
C108-2 "10n/100V" CAPC1608X08N 2600,662.5 r270 top
C109-1 "10n/100V" CAPC1608X08N 3643.75,662.5 r270 top
C109-2 "10n/100V" CAPC1608X08N 2537.5,662.5 r270 top
C110-1 "1u/35V" CAPC1608X08N 4293.87,884.75 r270 top
C110-2 "1u/35V" CAPC1608X08N 3193.75,787.5 r270 top
C111-1 "10n/100V" CAPC1608X08N 5712.5,2350 r0 top
C111-2 "10n/100V" CAPC1608X08N 3611.83,2350 r0 top
C112-1 "1u/35V" CAPC1608X08N 1049.21,2374.51 r0 top
C112-2 "1u/35V" CAPC1608X08N 1055,2109.51 r0 top
C113-1 "1u/35V" CAPC1608X08N 558,2528 r90 top
C113-2 "1u/35V" CAPC1608X08N 556.25,2225.79 r90 top
C114-1 "1u/35V" CAPC1608X08N 299.51,2400.79 r0 top
C114-2 "1u/35V" CAPC1608X08N 299.51,2113.29 r0 top
C115-1 "10n/100V" CAPC1608X08N 1114.31,2593.75 r180 top
C115-2 "10n/100V" CAPC1608X08N 1118.75,2318.75 r180 top
C400 "100n/50V" CAPC1608X08N 1011.71,1512.01 r0 top locked
C401 "100n/50V" CAPC1608X08N 1246.09,1437.01 r90 top
C402 "100n/50V" CAPC1608X08N 1246.09,1312.01 r270 top
C403 "100n/50V" CAPC1608X08N 1011.71,1237.01 r0 top locked
C404 "100n/50V" CAPC1608X08N 1161.71,1674.51 r90 top locked
C405 "100n/50V" CAPC1608X08N 261.71,1537.01 r180 top locked
C406 "100n/50V" CAPC1608X08N 1161.71,1974.51 r90 top locked
C407 "100n/50V" CAPC1608X08N 261.71,1837.01 r180 top locked
C600-1 "10n/100V" CAPC1608X08N 4086.64,1652.46 r270 top
C600-2 "10n/100V" CAPC1608X08N 1843.75,1725 r270 top
C601-1 "100n/50V" CAPC1608X08N 4583.48,2012.47 r270 top locked
C601-2 "100n/50V" CAPC1608X08N 2481.15,2010.73 r270 top locked
C602-1 "1u/250V" CAPC4532X16N 4093.75,2018.84 r270 top
C602-2 "1u/250V" CAPC4532X16N 1981.15,2023.23 r270 top
C603-1 "100n/100V" CAPC2012X14N 4206.25,2018.75 r270 top
C603-2 "100n/100V" CAPC2012X14N 2100,2018.75 r90 top
C604-1 "100n/50V" CAPC1608X08N 4183.48,1812.47 r180 top locked
C604-2 "100n/50V" CAPC1608X08N 2081.15,1810.73 r180 top locked
C605-1 "100n/50V" CAPC1608X08N 4783.48,1787.47 r0 top locked
C605-2 "100n/50V" CAPC1608X08N 2681.15,1785.73 r0 top
C606-1 "1u/35V" CAPC1608X08N 4585.98,1889.97 r270 top locked
C606-2 "1u/35V" CAPC1608X08N 2483.65,1888.23 r270 top locked
C607-1 "2u2/10V" CAPC2012X14N 4883.48,1812.47 r90 top locked
C607-2 "2u2/10V" CAPC2012X14N 2781.15,1810.73 r90 top
C608-1 "2u2/10V" CAPC2012X14N 4960.98,1812.47 r90 top
C608-2 "2u2/10V" CAPC2012X14N 2858.65,1810.73 r90 top
C700-1 "100n/50V" CAPC1608X08N 3450,562.5 r0 top
C700-2 "100n/50V" CAPC1608X08N 2250,555.26 r180 top
C701-1 "100n/50V" CAPC1608X08N 3337.5,562.5 r180 top locked
C701-2 "100n/50V" CAPC1608X08N 2362.5,555.26 r0 top
C800-1 "100n/50V" CAPC1608X08N 5986.71,1737.01 r180 top
C800-2 "100n/50V" CAPC1608X08N 3886.71,1737.01 r180 top
C801-1 "100n/50V" CAPC1608X08N 5093.75,2368.75 r270 top
C801-2 "100n/50V" CAPC1608X08N 2993.75,2368.75 r270 top
C900 "2u2/250V" CAPC2220(5750)230_N 1793.75,3362.5 r0 top
C901 "2u2/250V" CAPC2220(5750)230_N 1793.75,3131.25 r0 top
C902 "470p/100V" CAPC2012X14N 787.5,3612.5 r180 top locked
C903 "4n7/1000V" CAPC4532X16N 1325,3025 r0 top
C904 "1u/35V" CAPC1608X08N 598.58,2968.75 r0 top
C905 "22u/50V" CAPC2220(5750)230_N 556.25,3156.25 r90 top
C906 "100n/50V" CAPC1608X08N 725,3462.5 r180 top locked
C907 "1u/35V" CAPC1608X08N 612.5,3337.5 r0 top locked
C1100 "100n/50V" CAPC1608X08N 4863.29,2215.21 r270 top
C1300-1 "10n/100V" CAPC1608X08N 5424.21,1299.51 r270 top
C1300-2 "10n/100V" CAPC1608X08N 3324.21,1299.51 r270 top
C1301-1 "10n/100V" CAPC1608X08N 4824.21,1299.51 r270 top
C1301-2 "10n/100V" CAPC1608X08N 2724.21,1299.51 r270 top locked
C1302-1 "10n/100V" CAPC1608X08N 5474.21,1649.51 r0 top
C1302-2 "10n/100V" CAPC1608X08N 3374.21,1649.51 r0 top locked
C1303-1 "10n/100V" CAPC1608X08N 4874.21,1649.51 r0 top
C1303-2 "10n/100V" CAPC1608X08N 2774.21,1649.51 r0 top locked
C1304-1 "10n/100V" CAPC1608X08N 5524.21,1299.51 r270 top
C1304-2 "10n/100V" CAPC1608X08N 3424.21,1299.51 r270 top locked
C1305-1 "10n/100V" CAPC1608X08N 4924.21,1299.51 r270 top
C1305-2 "10n/100V" CAPC1608X08N 2824.21,1299.51 r270 top locked
C1306-1 "10n/100V" CAPC1608X08N 5574.21,1589.51 r0 top
C1306-2 "10n/100V" CAPC1608X08N 3474.21,1589.51 r0 top locked
C1307-1 "10n/100V" CAPC1608X08N 4974.21,1589.51 r0 top
C1307-2 "10n/100V" CAPC1608X08N 2874.21,1589.51 r0 top locked
C1308-1 "10n/100V" CAPC1608X08N 5624.21,1299.51 r270 top
C1308-2 "10n/100V" CAPC1608X08N 3524.21,1299.51 r270 top locked
C1309-1 "10n/100V" CAPC1608X08N 5024.21,1299.51 r270 top
C1309-2 "10n/100V" CAPC1608X08N 2924.21,1299.51 r270 top locked
C1310-1 "10n/100V" CAPC1608X08N 5674.21,1649.51 r0 top
C1310-2 "10n/100V" CAPC1608X08N 3574.21,1649.51 r0 top locked
C1311-1 "10n/100V" CAPC1608X08N 5074.21,1649.51 r0 top
C1311-2 "10n/100V" CAPC1608X08N 2974.21,1649.51 r0 top locked
C1312-1 "10n/100V" CAPC1608X08N 5724.21,1299.51 r270 top
C1312-2 "10n/100V" CAPC1608X08N 3624.21,1299.51 r270 top locked
C1313-1 "10n/100V" CAPC1608X08N 5124.21,1299.51 r270 top
C1313-2 "10n/100V" CAPC1608X08N 3024.21,1299.51 r270 top locked
C1314-1 "10n/100V" CAPC1608X08N 5774.21,1589.51 r0 top
C1314-2 "10n/100V" CAPC1608X08N 3674.21,1589.51 r0 top locked
C1315-1 "10n/100V" CAPC1608X08N 5174.21,1589.51 r0 top
C1315-2 "10n/100V" CAPC1608X08N 3074.21,1589.51 r0 top locked
C1316-1 "10n/100V" CAPC1608X08N 5824.21,1299.51 r270 top
C1316-2 "10n/100V" CAPC1608X08N 3724.21,1299.51 r270 top locked
C1317-1 "10n/100V" CAPC1608X08N 5224.21,1299.51 r270 top
C1317-2 "10n/100V" CAPC1608X08N 3124.21,1299.51 r270 top locked
C1318-1 "10n/100V" CAPC1608X08N 5874.21,1649.51 r0 top
C1318-2 "10n/100V" CAPC1608X08N 3774.21,1649.51 r0 top locked
C1319-1 "10n/100V" CAPC1608X08N 5274.21,1649.51 r0 top
C1319-2 "10n/100V" CAPC1608X08N 3174.21,1649.51 r0 top locked
C1320-1 "10n/100V" CAPC1608X08N 5924.21,1299.51 r270 top
C1320-2 "10n/100V" CAPC1608X08N 3824.21,1299.51 r270 top locked
C1321-1 "10n/100V" CAPC1608X08N 5324.21,1299.51 r270 top
C1321-2 "10n/100V" CAPC1608X08N 3224.21,1299.51 r270 top
C1322-1 "10n/100V" CAPC1608X08N 5974.21,1589.51 r0 top
C1322-2 "10n/100V" CAPC1608X08N 3874.21,1589.51 r0 top locked
C1323-1 "10n/100V" CAPC1608X08N 5374.21,1589.51 r0 top
C1323-2 "10n/100V" CAPC1608X08N 3274.21,1589.51 r0 top locked
C1400-1 "100n/100V" CAPC2012X14N 5061.71,1949.51 r90 top locked
C1400-2 "100n/100V" CAPC2012X14N 2961.71,1949.51 r90 top locked
C1401-1 "1u/35V" CAPC1608X08N 5493.75,2262.01 r270 top locked
C1401-2 "1u/35V" CAPC1608X08N 3393.71,2262.01 r270 top locked
C1402-1 "1u/35V" CAPC1608X08N 5556.25,2262.01 r270 top
C1402-2 "1u/35V" CAPC1608X08N 3456.25,2262.01 r270 top
C1403-1 "1u/35V" CAPC1608X08N 5325,2262.5 r270 top
C1403-2 "1u/35V" CAPC1608X08N 3224.21,2262.01 r270 top
C1404-1 "100p/50V" CAPC1608X08N 1825,1125 r270 top locked
C1404-2 "100p/50V" CAPC1608X08N 1175,1125 r270 top locked
C1405-1 "100p/50V" CAPC1608X08N 1762.5,1125 r270 top locked
C1405-2 "100p/50V" CAPC1608X08N 1112.5,1125 r270 top locked
D900 "PDS3200" PowerDI5 1800,3562.5 r0 top locked
D901 "DFLS1100-7" DIOD-POWERDI123-2_V 425,737.5 r90 top locked
D1100 "BAT54C,215" NXP-SOT23-3_V 3931.25,2099.51 r180 top locked
D1400-1 "DFLS1100-7" DIOD-POWERDI123-2_V 4725,1437.5 r90 top locked
D1400-2 "DFLS1100-7" DIOD-POWERDI123-2_V 2625,1437.5 r90 top locked
D1401-1 "SMAJ60A-E3/61" VISH-DO-214AC-2_N 4606.25,1431.25 r270 top
D1401-2 "SMAJ60A-E3/61" VISH-DO-214AC-2_N 2506.25,1431.25 r270 top
Designator12 "Comment" Fiducial_2 6102.36,393.7 r0 top locked
Designator13 "Comment" Fiducial_2 393.7,3740.16 r0 top locked
Designator26 "Comment" Hole_3.2_Iso 6102.36,3740.16 r0 top
Designator27 "Comment" Hole_3.2_Iso 6102.36,196.85 r0 top
Designator28 "Comment" layermarker6 2025,3862 r0 top
Designator28-1 "Comment" Hole_3.2_Iso 196.85,196.85 r0 top
Designator29 "Comment" Hole_3.2_Iso 196.85,3740.16 r0 top
F300 "fuse_0.5A_0448.500MR" LITTLEFUSE_448 4874.21,687.01 r90 top locked
F301 "fuse_0.25A_0466.250NR" LITTLEFUSE_466 4999.21,587.01 r90 top locked
F302 "fuse_0.25A_0466.250NR" LITTLEFUSE_466 5074.21,774.51 r90 top locked
F303 "fuse_0.25A_0466.250NR" LITTLEFUSE_466 5149.21,587.01 r90 top locked
F304 "fuse_0.25A_0466.250NR" LITTLEFUSE_466 5224.21,774.51 r90 top locked
F305 "fuse_0.25A_0466.250NR" LITTLEFUSE_466 5299.21,587.01 r90 top locked
F306 "fuse_0.25A_0466.250NR" LITTLEFUSE_466 5374.21,774.51 r90 top locked
F307 "fuse_0.25A_0466.250NR" LITTLEFUSE_466 5449.21,587.01 r90 top locked
F308 "fuse_0.25A_0466.250NR" LITTLEFUSE_466 5524.21,774.51 r90 top locked
F309 "fuse_0.25A_0466.250NR" LITTLEFUSE_466 5599.21,587.01 r90 top locked
F310 "fuse_0.25A_0466.250NR" LITTLEFUSE_466 5674.21,774.51 r90 top locked
F311 "fuse_0.25A_0466.250NR" LITTLEFUSE_466 5749.21,587.01 r90 top locked
F312 "fuse_0.25A_0466.250NR" LITTLEFUSE_466 5824.21,774.51 r90 top locked
F313 "fuse_0.25A_0466.250NR" LITTLEFUSE_466 5899.21,587.01 r90 top locked
F314 "fuse_0.5A_0448.500MR" LITTLEFUSE_448 6024.21,687.01 r90 top locked
F900 "fuse_1.25A_04661.25NR" LITTLEFUSE_466 425,550 r90 top locked
IC100-1 "ADG728BRUZ" ADI-RU-16_M 3906.25,856.25 r180 top
IC100-2 "ADG728BRUZ" ADI-RU-16_M 2818.75,856.25 r180 top
IC101-1 "ADG728BRUZ" ADI-RU-16_M 737.5,2537.5 r180 top
IC101-2 "ADG728BRUZ" ADI-RU-16_M 737.5,2250 r180 top
IC102-1 "ADG728BRUZ" ADI-RU-16_M 350,2537.5 r180 top
IC102-2 "ADG728BRUZ" ADI-RU-16_M 350,2250 r180 top
IC800-1 "M24M02-DWMN3TP/K" SOIC127P600X175-8N 5987.5,1875 r180 top locked
IC800-2 "M24M02-DWMN3TP/K" SOIC127P600X175-8N 3871.57,1875.25 r180 top locked
IC801-1 "MCP9800A0T-M/OT" SOT-23-OT5_L 4987.5,2387.5 r180 top locked
IC801-2 "MCP9800A0T-M/OT" SOT-23-OT5_L 2887.5,2387.5 r180 top locked
IC900 "LT8302HS8E#PBF" LT-S8E-8_V 800,3312.5 r0 top
IC1400-1 "LTC6811HG-1#PBF" LT-G-48_L 5374.21,1949.51 r90 top
IC1400-2 "LTC6811HG-1#PBF" LT-G-48_L 3274.21,1949.51 r90 top
L600-1 "220µH" TYS6045221M-10 4790.98,2012.47 r0 top
L600-2 "220µH" TYS6045221M-10 2688.65,2010.73 r0 top locked
L900 "74404042100" "WE-LQS 4018" 443.75,2925 r180 top locked
LD1400-1 "Green" LEDC1608X07N 5420,2399.51 r0 top locked
LD1400-2 "Green" LEDC1608X07N 3311.71,2399.51 r0 top locked
Q600-1 "PBSS4112PANP" PBSS4112PANP 4184.36,1630.66 r180 top locked
Q600-2 "PBSS4112PANP" PBSS4112PANP 1943.75,1725 r180 top locked
R100-1 "10k" RESC1608X05N 3423.35,474.31 r180 top locked
R100-2 "10k" RESC1608X05N 2293.65,475 r180 top locked
R101-1 "10k" RESC1608X05N 3656.25,475 r180 top locked
R101-2 "10k" RESC1608X05N 2524.21,475 r180 top locked
R102-1 "10k" RESC1608X05N 3893.75,475 r180 top
R102-2 "10k" RESC1608X05N 2763.78,475 r180 top locked
R103-1 "10k" RESC1608X05N 4131.25,475 r180 top
R103-2 "10k" RESC1608X05N 3001.51,475 r180 top
R104-1 "10k" RESC1608X05N 3537.5,475 r180 top locked
R104-2 "10k" RESC1608X05N 2408.9,475 r180 top locked
R105-1 "10k" RESC1608X05N 3775,475 r180 top locked
R105-2 "10k" RESC1608X05N 2642.93,475 r180 top locked
R106-1 "10k" RESC1608X05N 4012.5,475 r180 top
R106-2 "10k" RESC1608X05N 2885,475 r180 top
R107-1 "10k" RESC1608X05N 4250,475 r180 top
R107-2 "10k" RESC1608X05N 3118.75,475 r180 top
R108-1 "100R" RESC1608X05N 4081.25,556.25 r270 top locked
R108-2 "100R" RESC1608X05N 2975,556.25 r270 top locked
R109-1 "100R" RESC1608X05N 4018.75,556.25 r270 top locked
R109-2 "100R" RESC1608X05N 2912.5,556.25 r270 top locked
R110-1 "100R" RESC1608X05N 3956.25,556.25 r270 top locked
R110-2 "100R" RESC1608X05N 2850,556.25 r270 top locked
R111-1 "100R" RESC1608X05N 3893.75,556.25 r270 top locked
R111-2 "100R" RESC1608X05N 2787.5,556.25 r270 top locked
R112-1 "100R" RESC1608X05N 3831.25,556.25 r270 top locked
R112-2 "100R" RESC1608X05N 2725,556.25 r270 top
R113-1 "100R" RESC1608X05N 3768.75,556.25 r270 top
R113-2 "100R" RESC1608X05N 2662.5,556.25 r270 top locked
R114-1 "100R" RESC1608X05N 3706.25,556.25 r270 top locked
R114-2 "100R" RESC1608X05N 2600,556.25 r270 top locked
R115-1 "100R" RESC1608X05N 3643.75,556.25 r270 top locked
R115-2 "100R" RESC1608X05N 2537.5,556.25 r270 top locked
R116-1 "100R" RESC1608X05N 4208.48,1006.25 r0 top locked
R116-2 "100R" RESC1608X05N 3112.5,906.25 r0 top locked
R117-1 "0R" RESC1608X05N 4207.05,758.86 r180 top
R117-2 "0R" RESC1608X05N 3093.75,662.5 r180 top locked
R118-1 "100R" RESC1608X05N 1006.25,2593.75 r0 top locked
R118-2 "100R" RESC1608X05N 1012.5,2318.75 r0 top locked
R119-1 "0R" RESC1608X05N 1147.29,2485 r270 top
R119-2 "0R" RESC1608X05N 1145,2229.17 r270 top
R600-1 "10k" RESC1608X05N 4029.81,1652.46 r90 top locked
R600-2 "10k" RESC1608X05N 1781.25,1725 r90 top locked
R601-1 "0R" RESC1608X05N 4184.35,1716.21 r180 top
R601-2 "0R" RESC1608X05N 1943.75,1810.73 r180 top
R602-1 "68k" RESC1608X05N 4118.61,1546.91 r180 top
R602-2 "68k" RESC1608X05N 1881.25,1642.17 r180 top locked
R603-1 "124k" RESC1608X05N 4195.98,1899.97 r90 top locked
R603-2 "124k" RESC1608X05N 2093.65,1898.23 r90 top locked
R604-1 "10k" RESC1608X05N 4331.11,1630.66 r90 top locked
R604-2 "10k" RESC1608X05N 2096.34,1725 r90 top locked
R605-1 "0R" RESC1608X05N 4391.66,1630.65 r270 top
R605-2 "0R" RESC1608X05N 2156.25,1725 r270 top locked
R606-1 "1k5" RESC1608X05N 4783.48,1849.97 r180 top
R606-2 "1k5" RESC1608X05N 2681.15,1848.23 r180 top
R607-1 "1R" RESC2012X05N 4980.98,1949.97 r270 top
R607-2 "1R" RESC2012X05N 2878.65,1948.23 r270 top locked
R608-1 "124k" RESC1608X05N 4271.86,1630.66 r90 top
R608-2 "124k" RESC1608X05N 2037.5,1725 r90 top locked
R609-1 "10k" RESC1608X05N 4295.98,1812.47 r0 top locked
R609-2 "10k" RESC1608X05N 2193.65,1810.73 r0 top
R610-1 "1k" RESC1608X05N 4670.98,1849.97 r180 top
R610-2 "1k" RESC1608X05N 2568.65,1848.23 r180 top locked
R700-1 "10k" RESC1608X05N 3686.71,899.51 r90 top locked
R700-2 "10k" RESC1608X05N 2586.71,899.51 r90 top locked
R701-1 "10k" RESC1608X05N 3624.21,899.51 r90 top locked
R701-2 "10k" RESC1608X05N 2524.21,899.51 r90 top locked
R702-1 "10k" RESC1608X05N 3561.71,899.51 r90 top locked
R702-2 "10k" RESC1608X05N 2461.71,899.51 r90 top locked
R703-1 "10k" RESC1608X05N 3499.21,899.51 r90 top locked
R703-2 "10k" RESC1608X05N 2399.21,899.51 r90 top locked
R704-1 "10k" RESC1608X05N 3436.71,899.51 r90 top locked
R704-2 "10k" RESC1608X05N 2336.71,899.51 r90 top locked
R705-1 "10k" RESC1608X05N 3374.21,899.51 r90 top locked
R705-2 "10k" RESC1608X05N 2274.21,899.51 r90 top locked
R706-1 "10k" RESC1608X05N 3311.71,899.51 r90 top locked
R706-2 "10k" RESC1608X05N 2211.71,899.51 r90 top locked
R707-1 "10k" RESC1608X05N 3249.21,899.51 r90 top locked
R707-2 "10k" RESC1608X05N 2149.21,899.51 r90 top locked
R708-1 "10k" RESC1608X05N 3575,625 r90 top locked
R708-2 "10k" RESC1608X05N 2479.67,615.2 r90 top locked
R800-1 "10k" RESC1608X05N 5987.5,2012.5 r0 top locked
R800-2 "10k" RESC1608X05N 3862.5,2012.01 r180 top
R801-1 "10k" RESC1608X05N 4987.5,2481.25 r180 top locked
R801-2 "10k" RESC1608X05N 2881.25,2481.25 r180 top
R900 "39R" RESC2012X05N 925,3612.5 r180 top locked
R901 "390k" RESC1608X05N 612.5,3400 r180 top
R902 "150k" RESC1608X05N 962.5,3262.5 r270 top locked
R903 "115k" RESC1608X05N 962.5,3375 r270 top locked
R904 "10k" RESC1608X05N 875,3462.5 r0 top
R905 "86k6" RESC1608X05N 612.5,3462.5 r0 top
R1100 "150R" RESC1608X05N 4160.92,2556.25 r270 top locked
R1101 "150R" RESC1608X05N 2310.52,2553.22 r270 top locked
R1102 "150R" RESC1608X05N 4260.92,2556.25 r270 top locked
R1103 "150R" RESC1608X05N 2410.52,2553.22 r270 top locked
R1104 "150R" RESC1608X05N 4410.92,2556.25 r270 top locked
R1105 "150R" RESC1608X05N 2510.52,2553.22 r270 top locked
R1106 "150R" RESC1608X05N 4510.92,2556.25 r270 top locked
R1107 "150R" RESC1608X05N 2610.52,2553.22 r270 top locked
R1108 "150R" RESC1608X05N 4610.92,2556.25 r270 top locked
R1109 "150R" RESC1608X05N 3960.92,2556.25 r270 top locked
R1110 "150R" RESC1608X05N 4710.92,2556.25 r270 top locked
R1111 "150R" RESC1608X05N 4060.92,2556.25 r270 top locked
R1112 "10k" RESC1608X05N 4925,2214.72 r90 top locked
R1300-1 "100R" RESC1608X05N 5374.21,1174.51 r90 top
R1300-2 "100R" RESC1608X05N 3274.21,1174.51 r90 top
R1301-1 "100R" RESC1608X05N 4774.21,1174.51 r90 top locked
R1301-2 "100R" RESC1608X05N 2674.21,1174.51 r90 top locked
R1302-1 "100R" RESC1608X05N 5474.21,1174.51 r90 top
R1302-2 "100R" RESC1608X05N 3374.21,1174.51 r90 top
R1303-1 "100R" RESC1608X05N 4874.21,1174.51 r90 top locked
R1303-2 "100R" RESC1608X05N 2774.21,1174.51 r90 top locked
R1304-1 "100R" RESC1608X05N 5574.21,1174.51 r90 top locked
R1304-2 "100R" RESC1608X05N 3474.21,1174.51 r90 top locked
R1305-1 "100R" RESC1608X05N 4974.21,1174.51 r90 top locked
R1305-2 "100R" RESC1608X05N 2874.21,1174.51 r90 top
R1306-1 "100R" RESC1608X05N 5674.21,1174.51 r90 top locked
R1306-2 "100R" RESC1608X05N 3574.21,1174.51 r90 top locked
R1307-1 "100R" RESC1608X05N 5074.21,1174.51 r90 top locked
R1307-2 "100R" RESC1608X05N 2974.21,1174.51 r90 top
R1308-1 "100R" RESC1608X05N 5774.21,1174.51 r90 top locked
R1308-2 "100R" RESC1608X05N 3674.21,1174.51 r90 top
R1309-1 "100R" RESC1608X05N 5174.21,1174.51 r90 top locked
R1309-2 "100R" RESC1608X05N 3074.21,1174.51 r90 top
R1310-1 "100R" RESC1608X05N 5874.21,1174.51 r90 top locked
R1310-2 "100R" RESC1608X05N 3774.21,1174.51 r90 top
R1311-1 "100R" RESC1608X05N 5274.21,1174.51 r90 top locked
R1311-2 "100R" RESC1608X05N 3174.21,1174.51 r90 top
R1312-1 "100R" RESC1608X05N 5974.21,1174.51 r90 top locked
R1312-2 "100R" RESC1608X05N 3874.21,1174.51 r90 top
R1400-1 "100R" RESC2012X05N 4725,1612.5 r90 top locked
R1400-2 "1M" RESC1608X05N 3171.09,2262.01 r90 top locked
R1401-1 "1M" RESC1608X05N 5271.09,2262.01 r90 top locked
R1401-2 "100R" RESC2012X05N 2625,1612.5 r90 top locked
R1402-1 "0R" RESC1608X05N 5433.59,2262.01 r90 top locked
R1402-2 "0R" RESC1608X05N 3333.59,2262.01 r90 top locked
R1403-1 "0R" RESC1608X05N 5377.34,2262.01 r270 top locked
R1403-2 "0R" RESC1608X05N 3277.34,2262.01 r270 top locked
R1404-1 "10k" RESC1608X05N 5862.5,2337.5 r0 top locked
R1404-2 "10k" RESC1608X05N 3762.5,2337.5 r0 top locked
R1405-1 "0R" RESC1608X05N 5712.5,2406.25 r180 top
R1405-2 "0R" RESC1608X05N 3611.83,2406.25 r180 top
R1406-1 "0R" RESC1608X05N 5711.71,2294.51 r180 top locked
R1406-2 "270R" RESC1608X05N 3200,2400 r0 top locked
R1407-1 "270R" RESC1608X05N 5305,2399.51 r0 top locked
R1407-2 "0R" RESC1608X05N 3611.71,2294.51 r180 top locked
R1408-1 "10k" RESC1608X05N 5862.5,2225 r0 top locked
R1408-2 "10k" RESC1608X05N 3762.5,2225 r0 top locked
R1409-1 "0R" RESC1608X05N 5711.71,2224.51 r180 top locked
R1409-2 "0R" RESC1608X05N 3611.71,2224.51 r180 top locked
R1410-1 "0R" RESC1608X05N 5711.71,2169.51 r180 top locked
R1410-2 "0R" RESC1608X05N 3611.71,2169.51 r180 top locked
R1411-1 "10k" RESC1608X05N 5862.5,2112.5 r0 top locked
R1411-2 "10k" RESC1608X05N 3762.5,2112.5 r0 top locked
R1412-1 "0R" RESC1608X05N 5711.71,2099.51 r180 top locked
R1412-2 "0R" RESC1608X05N 3611.71,2099.51 r180 top locked
R1413-1 "0R" RESC1608X05N 5711.71,2044.51 r180 top locked
R1413-2 "0R" RESC1608X05N 3611.71,2044.51 r180 top locked
R1414-1 "0R" RESC1608X05N 5711.71,1974.51 r180 top locked
R1414-2 "0R" RESC1608X05N 3611.71,1974.51 r180 top locked
R1415-1 "1k21" RESC1608X05N 5800,1950 r90 top
R1415-2 "1k21" RESC1608X05N 3699.21,1946.46 r90 top
R1416-1 "1k21" RESC1608X05N 5799.21,1820 r90 top
R1416-2 "1k21" RESC1608X05N 3699.21,1823.23 r90 top
R1417-1 "0R" RESC1608X05N 5711.71,1919.51 r180 top locked
R1417-2 "0R" RESC1608X05N 3611.71,1919.51 r180 top locked
R1418-1 "0R" RESC1608X05N 5711.71,1849.51 r180 top locked
R1418-2 "0R" RESC1608X05N 3611.71,1849.51 r180 top locked
R1419-1 "1k21" RESC1608X05N 5158.59,2262.01 r270 top locked
R1419-2 "0R" RESC1608X05N 3611.71,1794.51 r180 top locked
R1420-1 "0R" RESC1608X05N 5711.71,1794.51 r180 top locked
R1420-2 "1k21" RESC1608X05N 3058.59,2262.01 r270 top locked
R1421-1 "820R" RESC1608X05N 5214.84,2262.01 r270 top locked
R1421-2 "820R" RESC1608X05N 3114.84,2262.01 r270 top locked
R1422-1 "120R" RESC1608X05N 1937.5,1100 r0 top locked
R1422-2 "120R" RESC1608X05N 1286.71,1099.51 r0 top locked
R1423-1 "120R" RESC1608X05N 1650,1100 r0 top locked
R1423-2 "120R" RESC1608X05N 999.21,1099.51 r0 top locked
R1500 "3k3" RESC1608X05N 2399.21,2787.01 r180 top locked
R1501 "3k3" RESC1608X05N 4049.21,2787.01 r180 top locked
R1502 "68R" RESC5025X07N 2474.21,3137.01 r270 top
R1503 "68R" RESC5025X07N 2475.79,3612.99 r90 top locked
R1504 "68R" RESC5025X07N 4124.21,3137.01 r270 top
R1505 "68R" RESC5025X07N 4125.79,3612.99 r90 top locked
R1506 "3k3" RESC1608X05N 2674.21,2787.01 r180 top locked
R1507 "3k3" RESC1608X05N 4324.21,2787.01 r180 top locked
R1508 "68R" RESC5025X07N 2749.21,3137.01 r270 top
R1509 "68R" RESC5025X07N 2750.79,3612.99 r90 top locked
R1510 "68R" RESC5025X07N 4399.21,3137.01 r270 top
R1511 "68R" RESC5025X07N 4400.79,3612.99 r90 top locked
R1512 "3k3" RESC1608X05N 2949.21,2787.01 r180 top locked
R1513 "3k3" RESC1608X05N 4599.21,2787.01 r180 top locked
R1514 "68R" RESC5025X07N 3024.21,3137.01 r270 top
R1515 "68R" RESC5025X07N 3025.79,3612.99 r90 top locked
R1516 "68R" RESC5025X07N 4674.21,3137.01 r270 top
R1517 "68R" RESC5025X07N 4675.79,3612.99 r90 top locked
R1518 "3k3" RESC1608X05N 3224.21,2787.01 r180 top locked
R1519 "3k3" RESC1608X05N 4874.21,2787.01 r180 top locked
R1520 "68R" RESC5025X07N 3299.21,3137.01 r270 top
R1521 "68R" RESC5025X07N 3300.79,3612.99 r90 top locked
R1522 "68R" RESC5025X07N 4949.21,3137.01 r270 top
R1523 "68R" RESC5025X07N 4950.79,3612.99 r90 top locked
R1524 "3k3" RESC1608X05N 3499.21,2787.01 r180 top locked
R1525 "3k3" RESC1608X05N 5149.21,2787.01 r180 top locked
R1526 "68R" RESC5025X07N 5224.21,3137.01 r270 top
R1527 "68R" RESC5025X07N 5225.79,3612.99 r90 top locked
R1528 "68R" RESC5025X07N 3574.21,3137.01 r270 top
R1529 "68R" RESC5025X07N 3575.79,3612.99 r90 top locked
R1530 "3k3" RESC1608X05N 5424.21,2787.01 r180 top locked
R1531 "3k3" RESC1608X05N 3774.21,2787.01 r180 top locked
R1532 "68R" RESC5025X07N 3849.21,3137.01 r270 top
R1533 "68R" RESC5025X07N 3850.79,3612.99 r90 top locked
R1534 "68R" RESC5025X07N 5499.21,3137.01 r270 top
R1535 "68R" RESC5025X07N 5500.79,3612.99 r90 top locked
SJ300 "0R" RESC1608X05N 4874.21,487.01 r0 top locked
SJ301 "0R" RESC1608X05N 6024.21,487.01 r0 top locked
T1500 "NX2301P,215" NXP-SOT23_N 2524.21,2787.01 r90 top locked
T1501 "NX2301P,215" NXP-SOT23_N 4174.21,2787.01 r90 top locked
T1502 "NX2301P,215" NXP-SOT23_N 2799.21,2787.01 r90 top locked
T1503 "NX2301P,215" NXP-SOT23_N 4449.21,2787.01 r90 top locked
T1504 "NX2301P,215" NXP-SOT23_N 3074.21,2787.01 r90 top locked
T1505 "NX2301P,215" NXP-SOT23_N 4724.21,2787.01 r90 top locked
T1506 "NX2301P,215" NXP-SOT23_N 3349.21,2787.01 r90 top locked
T1507 "NX2301P,215" NXP-SOT23_N 4999.21,2787.01 r90 top locked
T1508 "NX2301P,215" NXP-SOT23_N 3624.21,2787.01 r90 top locked
T1509 "NX2301P,215" NXP-SOT23_N 5274.21,2787.01 r90 top locked
T1510 "NX2301P,215" NXP-SOT23_N 5549.21,2787.01 r90 top locked
T1511 "NX2301P,215" NXP-SOT23_N 3899.21,2787.01 r90 top locked
TP900 "Testpoint_Square" Testpoint_S1 1800,2843.75 r90 top
TP901 "Testpoint_Square" Testpoint_S1 600,718.75 r90 top locked
TP902 "Testpoint_Square" Testpoint_S1 1700,2843.75 r90 top
TP903 "Testpoint_Square" Testpoint_S1 700,718.75 r90 top
TP1400-1 "Testpoint_Square" Testpoint_S1 5861.71,2274.51 r0 top locked
TP1400-2 "Testpoint_Square" Testpoint_S1 3761.71,2274.51 r180 top locked
TP1401-1 "Testpoint_Square" Testpoint_S1 5861.71,2387.01 r0 top locked
TP1401-2 "Testpoint_Square" Testpoint_S1 3761.71,2387.01 r180 top locked
TP1402-1 "Testpoint_Square" Testpoint_S1 5511.71,2399.51 r180 top
TP1402-2 "Testpoint_Square" Testpoint_S1 3411.71,2399.51 r0 top locked
TP1403-1 "Testpoint_Square" Testpoint_S1 5174.21,2399.51 r180 top
TP1403-2 "Testpoint_Square" Testpoint_S1 3074.21,2399.51 r180 top
TP1404-1 "Testpoint_Square" Testpoint_S1 5861.71,2162.01 r180 top locked
TP1404-2 "Testpoint_Square" Testpoint_S1 3761.71,2162.01 r180 top locked
TP1405-1 "Testpoint_Square" Testpoint_S1 5861.71,2049.51 r180 top locked
TP1405-2 "Testpoint_Square" Testpoint_S1 3761.71,2049.51 r180 top locked
TP1406-1 "Testpoint_Square" Testpoint_S1 1562.5,362.5 r90 top locked
TP1406-2 "Testpoint_Square" Testpoint_S1 1012.5,362.5 r270 top locked
TP1407-1 "Testpoint_Square" Testpoint_S1 1837.5,362.5 r90 top locked
TP1407-2 "Testpoint_Square" Testpoint_S1 1287.5,362.5 r270 top locked
TR900 "WE_750313457" WE_750313457 1325,3387.5 r0 top locked
TR1400-1 "HM2102NL" HM2102NL 1793.75,750 r90 top locked
TR1400-2 "HM2102NL" HM2102NL 1143.75,750 r90 top locked
U100-1 "AD8628ARTZ-R2" ADI-RJ-5_M 4181.26,883.86 r270 top locked
U100-2 "AD8628ARTZ-R2" ADI-RJ-5_M 3087.5,787.5 r270 top locked
U101-1 "AD8628ARTZ-R2" ADI-RJ-5_M 1020.67,2485 r0 top locked
U101-2 "AD8628ARTZ-R2" ADI-RJ-5_M 1020.67,2211.61 r0 top locked
U600-1 "LM5161QPWPRQ1" PWP0014A 4395.98,1962.47 r0 top
U600-2 "LM5161QPWPRQ1" PWP0014A 2293.65,1960.73 r0 top
U700-1 "TCA6408APWR" PW0016A_L 3400,700 r180 top
U700-2 "TCA6408APWR" PW0016A_L 2305.46,692.76 r180 top
U1100 "ACPL-217" SOIC127P700X220-4N 4136.71,2331.25 r270 top locked
U1101 "ACPL-217" SOIC127P700X220-4N 2198.81,2328.71 r270 top locked
U1102 "ACPL-217" SOIC127P700X220-4N 4260.92,2331.25 r270 top locked
U1103 "ACPL-217" SOIC127P700X220-4N 2336.31,2328.71 r270 top locked
U1104 "ACPL-217" SOIC127P700X220-4N 4385.83,2331.25 r270 top locked
U1105 "ACPL-217" SOIC127P700X220-4N 2473.81,2328.71 r270 top locked
U1106 "ACPL-217" SOIC127P700X220-4N 4510.92,2331.25 r270 top locked
U1107 "ACPL-217" SOIC127P700X220-4N 2611.31,2328.71 r270 top locked
U1108 "ACPL-217" SOIC127P700X220-4N 4636.71,2331.25 r270 top locked
U1109 "ACPL-217" SOIC127P700X220-4N 3885,2331.25 r270 top locked
U1110 "ACPL-217" SOIC127P700X220-4N 4761.61,2331.25 r270 top locked
U1111 "ACPL-217" SOIC127P700X220-4N 4012.5,2331.25 r270 top locked
X200 "molex_microfit_3_12x2_THT" MOLEX_MICROFIT_12x2_THT 5147.8,98.43 r180 top locked
X201 "molex_microfit_3_08x2_THT" MOLEX_MICROFIT_08x2_THT 3788.84,98.43 r180 top locked
X202 "molex_microfit_3_08x2_THT" MOLEX_MICROFIT_08x2_THT 2670.48,98.43 r180 top locked
X400 "gen_pinheader_2.54_2x9" Pinheader_2.54_2x9 650,1675 r180 top locked
X401 "gen_pinheader_2.54_2x5" Pinheader_2.54_2x5 1450,1675 r180 top locked
X402 "gen_pinheader_2.54_2x10" Pinheader_2.54_2x10 700,1375 r180 top locked
X403 "gen_pinheader_2.54_2x9" Pinheader_2.54_2x9 650,1975 r180 top locked
X404 "gen_pinheader_2.54_2x5" Pinheader_2.54_2x5 1450,1975 r180 top locked
X500 "molex_microfit_3_01x2_THT" MOLEX_MICROFIT_01x2_THT 1960.13,98.43 r180 top locked
X501 "molex_microfit_3_01x2_THT" MOLEX_MICROFIT_01x2_THT 1667.87,98.43 r180 top locked
X502 "molex_microfit_3_01x2_THT" MOLEX_MICROFIT_01x2_THT 1375.6,98.43 r180 top locked
X503 "molex_microfit_3_01x2_THT" MOLEX_MICROFIT_01x2_THT 1083.34,98.43 r180 top locked
X900 "gen_pinheader_2.54_2" Pinheader_2.54_2 1750,2937.5 r180 top
X1000 "samtec_TSW-102-07-G-D" Pinheader_2.54_2x2 650,550 r0 top locked
X1001 "molex_microfit_3_01x2_THT" MOLEX_MICROFIT_01x2_THT 791.07,98.43 r180 top locked
X1002 "molex_microfit_3_01x2_THT" MOLEX_MICROFIT_01x2_THT 498.81,98.43 r180 top locked
Z1300-1 "MMSZ4692T1G" ONSC-SOD-123-2-425-04_V 5474.21,1499.51 r0 top locked
Z1300-2 "MMSZ4692T1G" ONSC-SOD-123-2-425-04_V 3374.21,1499.51 r0 top
Z1301-1 "MMSZ4692T1G" ONSC-SOD-123-2-425-04_V 4874.21,1499.51 r0 top locked
Z1301-2 "MMSZ4692T1G" ONSC-SOD-123-2-425-04_V 2774.21,1499.51 r0 top
Z1302-1 "MMSZ4692T1G" ONSC-SOD-123-2-425-04_V 5574.21,1399.51 r0 top locked
Z1302-2 "MMSZ4692T1G" ONSC-SOD-123-2-425-04_V 3474.21,1399.51 r0 top
Z1303-1 "MMSZ4692T1G" ONSC-SOD-123-2-425-04_V 4974.21,1399.51 r0 top locked
Z1303-2 "MMSZ4692T1G" ONSC-SOD-123-2-425-04_V 2874.21,1399.51 r0 top
Z1304-1 "MMSZ4692T1G" ONSC-SOD-123-2-425-04_V 5674.21,1499.51 r0 top locked
Z1304-2 "MMSZ4692T1G" ONSC-SOD-123-2-425-04_V 3574.21,1499.51 r0 top
Z1305-1 "MMSZ4692T1G" ONSC-SOD-123-2-425-04_V 5074.21,1499.51 r0 top locked
Z1305-2 "MMSZ4692T1G" ONSC-SOD-123-2-425-04_V 2974.21,1499.51 r0 top
Z1306-1 "MMSZ4692T1G" ONSC-SOD-123-2-425-04_V 5774.21,1399.51 r0 top locked
Z1306-2 "MMSZ4692T1G" ONSC-SOD-123-2-425-04_V 3674.21,1399.51 r0 top
Z1307-1 "MMSZ4692T1G" ONSC-SOD-123-2-425-04_V 5174.21,1399.51 r0 top locked
Z1307-2 "MMSZ4692T1G" ONSC-SOD-123-2-425-04_V 3074.21,1399.51 r0 top
Z1308-1 "MMSZ4692T1G" ONSC-SOD-123-2-425-04_V 5874.21,1499.51 r0 top locked
Z1308-2 "MMSZ4692T1G" ONSC-SOD-123-2-425-04_V 3774.21,1499.51 r0 top
Z1309-1 "MMSZ4692T1G" ONSC-SOD-123-2-425-04_V 5274.21,1499.51 r0 top locked
Z1309-2 "MMSZ4692T1G" ONSC-SOD-123-2-425-04_V 3174.21,1499.51 r0 top
Z1310-1 "MMSZ4692T1G" ONSC-SOD-123-2-425-04_V 5974.21,1399.51 r0 top locked
Z1310-2 "MMSZ4692T1G" ONSC-SOD-123-2-425-04_V 3874.21,1399.51 r0 top locked
Z1311-1 "MMSZ4692T1G" ONSC-SOD-123-2-425-04_V 5374.21,1399.51 r0 top locked
Z1311-2 "MMSZ4692T1G" ONSC-SOD-123-2-425-04_V 3274.21,1399.51 r0 top

## Footprints (in the part's own frame and the unit in brackets; to place one, negate y for a bottom-side part, rotate by r counter-clockwise, add the part's x,y. Pads: shape width x height; smd on the part's side, far side on the other; paste and mask are expansions set on the pad)
ADI-RJ-5_M [mm] "SOT-23, 5-Leads, Body 2.9x1.6mm, Pitch 0.95mm, IPC Low Density"
  rect 1.3x0.7 smd: 1(-1.2,0.95) 2(-1.2,0) 3(-1.2,-0.95) 4(1.2,-0.95) 5(1.2,0.95)
  silkscreen extent -1.32,-1.5 0.15,1.98, body extent -0.85,-1.5 0.85,1.5, height 1.45
ADI-RU-16_M [mm] "SOP, 16-Leads, Body 5x4.4mm, Pitch 0.65mm, IPC Low Density"
  oval 1.85x0.35 smd: 1(-2.925,2.275) 2(-2.925,1.625) 3(-2.925,0.975) 4(-2.925,0.325) 5(-2.925,-0.325) 6(-2.925,-0.975) 7(-2.925,-1.625) 8(-2.925,-2.275) 9(2.925,-2.275) 10(2.925,-1.625) 11(2.925,-0.975) 12(2.925,-0.325) 13(2.925,0.325) 14(2.925,0.975) 15(2.925,1.625) 16(2.925,2.275)
  silkscreen extent -3.05,-2.55 1.6,3.12, body extent -2.25,-2.55 2.25,2.55, height 1.2
CAPC1608X08N [mm] "Chip Capacitor, 2-Leads, Body 1,60x0,80mm, IPC Medium Density"
  rrect50% 0.75x0.95 smd: 1(-0.725,0) 2(0.725,0)
  body extent -0.85,-0.45 0.85,0.45, height 0.8
CAPC2012X14N [mm] "Chip Capacitor, 2-Leads, Body 2,00x1,25mm, IPC Medium Density"
  rrect40% 0.9x1.45 smd: 1(-1.025,0) 2(1.025,0)
  silkscreen extent -0.2,-0.63 0.2,0.63, body extent -1.1,-0.72 1.1,0.72, height 1.45
CAPC2220(5750)230_N [mm] "Chip Capacitor, Body 5.7x5.0mm, Height 2.3mm, IPC Medium Density"
  rect 1.55x5.4 smd: 1(-2.625,0) 2(2.625,0)
  silkscreen extent -1.45,-2.6 1.45,2.6, body extent -3.05,-2.7 3.05,2.7, height 2.3
CAPC4532X16N [mm] "Chip Capacitor, 2-Leads, Body 4,50x3,20mm, IPC Medium Density"
  rect 1.6x3.5 smd: 1(-1.95,0) 2(1.95,0)
  silkscreen extent -0.75,-1.65 0.75,1.65, body extent -2.4,-1.75 2.4,1.75, height 1.55
DIOD-POWERDI123-2_V [mm] "SOD, 2-Leads, Body 2.8x1.78mm"
  rect 1.05x1.5 smd: 1(-1.525,0)
  rect 2.4x1.5 smd: 2(0.85,0)
  silkscreen extent 2.55,-0.89 2.55,0.89, body extent -1.4,-0.89 1.4,0.89, height 1.01
Fiducial_2 [mm] "Fiducial Round 1mm"
  round 1 smd paste-0.5 mask+0.5: 0(0,0)
  Top Copper keep-out circle w0.2: c0,0 r0.9
HM2102NL [mil]
  rect 67.5x40 smd: 1(-271.65,196.85)
  rrect50% 67.5x40 smd: 2(-271.65,117.85) 3(-271.65,38.85) 4(-271.65,-40.15) 5(-271.65,-119.15) 6(-271.65,-198.15) 7(270.85,-198.15) 8(270.85,-119.15) 9(270.85,-40.15) 10(270.85,38.85) 11(270.85,117.85) 12(270.85,196.85)
  silkscreen extent -224,-300 224,300, body extent -224,-299 224,299, height 197
Hole_3.2_Iso [mm]
  round 7 hole 3.2: Hole_3.2(0,0)
layermarker6 [mil]
  Top Copper lines w6: 0,0 0,50 ; 0,0 300,0 ; 0,0 0,50 ; 0,0 300,0 ; 0,50 300,50 ; 0,50 300,50 ; 300,0 300,50 ; 300,0 300,50 ; 50,0 50,50 50,0 ; 100,0 100,50 100,0 ; 150,0 150,50 150,0 ; 200,0 200,50 200,0 ; 250,0 250,50 250,0
  FUSED_VBAT- lines w6: 0,0 300,0 ; 0,0 0,50 ; 0,0 300,0 ; 0,0 0,50 ; 0,50 300,50 ; 0,50 300,50 ; 300,0 300,50 ; 300,0 300,50 ; 50,0 50,50 50,0 ; 100,0 100,50 100,0 ; 150,0 150,50 150,0 ; 200,0 200,50 200,0 ; 250,0 250,50 250,0
  Signal Layer 2 lines w6: 0,0 300,0 ; 0,0 0,50 ; 0,0 300,0 ; 0,0 0,50 ; 0,50 300,50 ; 0,50 300,50 ; 300,0 300,50 ; 300,0 300,50 ; 50,0 50,50 50,0 ; 100,0 100,50 100,0 ; 150,0 150,50 150,0 ; 200,0 200,50 200,0 ; 250,0 250,50 250,0
  Signal Layer 3 lines w6: 0,0 300,0 ; 0,0 0,50 ; 0,0 300,0 ; 0,0 0,50 ; 0,50 300,50 ; 0,50 300,50 ; 300,0 300,50 ; 300,0 300,50 ; 50,0 50,50 50,0 ; 100,0 100,50 100,0 ; 150,0 150,50 150,0 ; 200,0 200,50 200,0 ; 250,0 250,50 250,0
  VREG lines w6: 0,0 300,0 ; 0,0 0,50 ; 0,0 300,0 ; 0,0 0,50 ; 0,50 300,50 ; 0,50 300,50 ; 300,0 300,50 ; 300,0 300,50 ; 50,0 50,50 50,0 ; 100,0 100,50 100,0 ; 150,0 150,50 150,0 ; 200,0 200,50 200,0 ; 250,0 250,50 250,0
  Bot Copper lines w6: 0,0 300,0 ; 0,0 0,50 ; 0,0 300,0 ; 0,0 0,50 ; 0,50 300,50 ; 0,50 300,50 ; 300,0 300,50 ; 300,0 300,50 ; 50,0 50,50 50,0 ; 100,0 100,50 100,0 ; 150,0 150,50 150,0 ; 200,0 200,50 200,0 ; 250,0 250,50 250,0
LEDC1608X07N [mm] "LED, 2-Leads, Body 1,60x0,80mm, IPC Medium Density"
  rrect50% 0.7x0.9 smd: 1(-0.7,0) 2(0.7,0)
  silkscreen extent -1.35,0.35 -1.25,0.45, body extent -0.8,-0.4 0.8,0.4, height 0.7
LITTLEFUSE_448 [mm] "Littlefuse 448 Series, 2-Leads, Body 6,10x2,69mm, IPC Medium Density"
  rect 1.96x3.15 smd: 1(-2.95,0) 2(2.95,0)
  silkscreen extent -1.1,-1.47 1.1,1.48, body extent -3.15,-1.47 3.15,1.47, height 2.94
LITTLEFUSE_466 [mm] "Littlefuse 466 Series, 2-Leads, Body 3,18x1,52mm"
  rect 1.3x2.03 smd: 1(-1.59,0) 2(1.59,0)
  silkscreen extent -0.55,-0.92 0.55,0.91, body extent -1.65,-0.82 1.65,0.82, height 0.66
LT-G-48_L [mm] "SOP, 48-Leads, Body 13.1x5.6mm, Pitch 0.5mm, IPC High Density"
  oval 1.9x0.25 smd: 1(-3.375,5.75) 2(-3.375,5.25) 3(-3.375,4.75) 4(-3.375,4.25) 5(-3.375,3.75) 6(-3.375,3.25) 7(-3.375,2.75) 8(-3.375,2.25) 9(-3.375,1.75) 10(-3.375,1.25) 11(-3.375,0.75) 12(-3.375,0.25) 13(-3.375,-0.25) 14(-3.375,-0.75) 15(-3.375,-1.25) 16(-3.375,-1.75) 17(-3.375,-2.25) 18(-3.375,-2.75) 19(-3.375,-3.25) 20(-3.375,-3.75) 21(-3.375,-4.25) 22(-3.375,-4.75) 23(-3.375,-5.25) 24(-3.375,-5.75) 25(3.375,-5.75) 26(3.375,-5.25) 27(3.375,-4.75) 28(3.375,-4.25) 29(3.375,-3.75) 30(3.375,-3.25) 31(3.375,-2.75) 32(3.375,-2.25) 33(3.375,-1.75) 34(3.375,-1.25) 35(3.375,-0.75) 36(3.375,-0.25) 37(3.375,0.25) 38(3.375,0.75) 39(3.375,1.25) 40(3.375,1.75) 41(3.375,2.25) 42(3.375,2.75) 43(3.375,3.25) 44(3.375,3.75) 45(3.375,4.25) 46(3.375,4.75) 47(3.375,5.25) 48(3.375,5.75)
  silkscreen extent -3.5,-6.55 2.02,6.55, body extent -2.8,-6.55 2.8,6.55, height 2
LT-S8E-8_V [mm] "SOIC, 8-Leads, Body 4.9x3.9mm, Pitch 1.27mm, Thermal Pad 3.25x2.26mm, Recommended"
  oval 1.143x0.76 smd: 1(-2.602,1.905) 2(-2.602,0.635) 3(-2.602,-0.635) 4(-2.602,-1.905) 5(2.601,-1.905) 6(2.601,-0.635) 7(2.601,0.635) 8(2.601,1.905)
  rect 2.26x2.99 smd: 9(0,0)
  silkscreen extent -2.73,-2.5 1.62,2.96, body extent -3.01,-2.45 3.01,2.45, height 1.75
MOLEX_MICROFIT_01x2_THT [mil] "Micro-Fit 3.0 Right Angle Header, 3.00mm Pitch, Dual Row, 2 Circuits, with Snap-in Plastic Peg PCB Lock, Tin, Glow Wire Capable, Black, 43045-0200"
  round 60 hole 40: 1(0,-170) 2(0,-287.99)
  round 39.37 hole 117.99 unplated paste+0 mask+4: ""(0,0)
  silkscreen extent -137,-209 137,85, body extent -141,-301 141,181, height 345
MOLEX_MICROFIT_08x2_THT [mil] "Micro-Fit 3.0 Right Angle Header, 3.00mm Pitch, Dual Row, 16 Circuits, with Snap-in Plastic Peg PCB Lock, Tin, Glow Wire Capable, Black, 43045-1600"
  round 60 hole 40: 1(-412.99,-170) 2(-295,-170) 3(-177.01,-170) 4(-59.02,-170) 5(59.02,-170) 6(177.01,-170) 7(295,-170) 8(412.99,-170) 9(-412.99,-287.99) 10(-295,-287.99) 11(-177.01,-287.99) 12(-59.02,-287.99) 13(59.02,-287.99) 14(177.01,-287.99) 15(295,-287.99) 16(412.99,-287.99)
  round 39.37 hole 117.99 unplated paste+0 mask+4: ""(-328.5,0) ""(328.5,0)
  silkscreen extent -551,-209 551,85, body extent -554,-301 554,181, height 345
MOLEX_MICROFIT_12x2_THT [mil] "Micro-Fit 3.0 Right Angle Header, 3.00mm Pitch, Dual Row, 24 Circuits, with Snap-in Plastic Peg PCB Lock, Tin, Glow Wire Capable, Black, 43045-2400"
  round 60 hole 40: 1(-649.49,-170) 2(-530.98,-170) 3(-412.99,-170) 4(-295,-170) 5(-177.01,-170) 6(-59.02,-170) 7(59.02,-170) 8(177.01,-170) 9(295,-170) 10(412.99,-170) 11(530.98,-170) 12(649.49,-170) 13(-649.49,-287.99) 14(-530.98,-287.99) 15(-412.99,-287.99) 16(-295,-287.99) 17(-177.01,-287.99) 18(-59.02,-287.99) 19(59.02,-287.99) 20(177.01,-287.99) 21(295,-287.99) 22(412.99,-287.99) 23(530.98,-287.99) 24(649.49,-287.99)
  round 39.37 hole 117.99 unplated paste+0 mask+4: ""(-565,0) ""(565,0)
  silkscreen extent -789,-209 790,85, body extent -790,-301 790,181, height 345
NXP-SOT23-3_V [mm] "SOT23, 3-Leads, Body 1.3x2.9mm, Pitch 0.95mm"
  rect 0.6x0.7 smd paste-0.05: 1(0.95,1) 2(-0.95,1) 3(0,-1)
  silkscreen extent -1.45,-0.65 1.88,0.65, body extent -1.45,-0.65 1.45,0.65, height 1.1
NXP-SOT23_N [mm] "SOT23, 3-Leads, Body 3x1.4mm, Pitch 0.95mm, IPC Medium Density"
  rect 1.4x0.6 smd: 1(-0.95,0.95) 2(-0.95,-0.95) 3(0.95,0)
  silkscreen extent -1.07,-1.5 0.7,1.92, body extent -0.7,-1.5 0.7,1.5, height 1.1
ONSC-SOD-123-2-425-04_V [mm] "SOD, 2-Leads, Body 2.69x1.6mm"
  rect 0.91x1.22 smd: 1(-1.635,0) 2(1.635,0)
  silkscreen extent -1.76,-0.8 0.78,1.28, body extent -1.35,-0.8 1.35,0.8, height 1.35
PBSS4112PANP [mm]
  rect 0.7x0.3 smd: 1(-0.995,0.65) 2(-0.995,0) 3(-0.995,-0.65) 4(0.995,-0.65) 5(0.995,0) 6(0.995,0.65)
  rect 1x0.67 smd: 7(0,0.49) 8(0,-0.49)
  silkscreen extent -1.5,-1.2 1.05,1.25, body extent -1.05,-1.05 1.05,1.05, height 0.65
Pinheader_2.54_2 [mm] "Pinheader, 2.54mm, gerade"
  round 1.75 hole 1: 1(-1.27,0) 2(1.27,0)
  silkscreen extent -2.47,-1.2 2.47,1.2, body extent -2.54,-1.27 2.54,1.27, height 8.74
Pinheader_2.54_2x2 [mm] "Pinheader, 2.54mm, gerade, 2-reihig"
  round 1.75 hole 1: 1(-1.27,-1.27) 2(-1.27,1.27) 3(1.27,-1.27) 4(1.27,1.27)
  silkscreen extent -2.47,-2.47 2.47,2.47, body extent -2.54,-2.54 2.54,2.54, height 8.74
Pinheader_2.54_2x5 [mm]
  round 1.75 hole 1: 1(-5.08,-1.27) 2(-5.08,1.27) 3(-2.54,-1.27) 4(-2.54,1.27) 5(0,-1.27) 6(0,1.27) 7(2.54,-1.27) 8(2.54,1.27) 9(5.08,-1.27) 10(5.08,1.27)
  silkscreen extent -6.28,-2.47 6.28,2.47, body extent -6.35,-2.54 6.35,2.54, height 8.74
Pinheader_2.54_2x9 [mm] "Pinheader, 2.54mm, gerade, 2-reihig"
  round 1.75 hole 1: 1(-10.16,-1.27) 2(-10.16,1.27) 3(-7.62,-1.27) 4(-7.62,1.27) 5(-5.08,-1.27) 6(-5.08,1.27) 7(-2.54,-1.27) 8(-2.54,1.27) 9(0,-1.27) 10(0,1.27) 11(2.54,-1.27) 12(2.54,1.27) 13(5.08,-1.27) 14(5.08,1.27) 15(7.62,-1.27) 16(7.62,1.27) 17(10.16,-1.27) 18(10.16,1.27)
  silkscreen extent -11.43,-2.47 11.43,2.47, body extent -11.43,-2.54 11.43,2.54, height 8.74
Pinheader_2.54_2x10 [mm] "Pinheader, 2.54mm, gerade, 2-reihig"
  round 1.75 hole 1: 1(-11.43,-1.27) 2(-11.43,1.27) 3(-8.89,-1.27) 4(-8.89,1.27) 5(-6.35,-1.27) 6(-6.35,1.27) 7(-3.81,-1.27) 8(-3.81,1.27) 9(-1.27,-1.27) 10(-1.27,1.27) 11(1.27,-1.27) 12(1.27,1.27) 13(3.81,-1.27) 14(3.81,1.27) 15(6.35,-1.27) 16(6.35,1.27) 17(8.89,-1.27) 18(8.89,1.27) 19(11.43,-1.27) 20(11.43,1.27)
  silkscreen extent -12.7,-2.47 12.7,2.47, body extent -12.7,-2.54 12.7,2.54, height 8.74
PowerDI5 [mm] "PowerDI5, 3-Leads, Body 3,97x6,50mm"
  rect 4.86x3.36 smd: 1(1.126,0)
  rect 1.39x1.4 smd: 2(-2.856,0.92) 3(-2.856,-0.92)
  silkscreen extent -1.88,-2.05 3.63,2.32, body extent -3.25,-2.02 3.25,2.02, height 1.15
PW0016A_L [mm] "SOP, 16-Leads, Body 5.1x4.5mm, Pitch 0.65mm, IPC High Density"
  rrect25% 1.2x0.4 smd: 1(-2.85,2.275) 2(-2.85,1.625) 3(-2.85,0.975) 4(-2.85,0.325) 5(-2.85,-0.325) 6(-2.85,-0.975) 7(-2.85,-1.625) 8(-2.85,-2.275) 9(2.85,-2.275) 10(2.85,-1.625) 11(2.85,-0.975) 12(2.85,-0.325) 13(2.85,0.325) 14(2.85,0.975) 15(2.85,1.625) 16(2.85,2.275)
  silkscreen extent -2.98,-2.55 1.85,3.15, body extent -3.21,-2.5 3.21,2.5, height 1
PWP0014A [mm] "TI PWP0014A Package"
  oval 1.4x0.45 smd: 1(-2.95,1.95) 2(-2.95,1.3) 3(-2.95,0.65) 4(-2.95,0) 5(-2.95,-0.65) 6(-2.95,-1.3) 7(-2.95,-1.95) 8(2.95,-1.95) 9(2.95,-1.3) 10(2.95,-0.65) 11(2.95,0) 12(2.95,0.65) 13(2.95,1.3) 14(2.95,1.95)
  rect 3x3.1 smd: 15(0,0)
  silkscreen extent -3.07,-2.55 1.85,2.85, body extent -3.2,-2.55 3.2,2.55, height 1.2
RESC1608X05N [mm] "Chip Resistor, 2-Leads, Body 1,60x0,80mm, IPC Medium Density"
  rrect50% 0.7x0.9 smd: 1(-0.7,0) 2(0.7,0)
  body extent -0.85,-0.45 0.85,0.45, height 0.45